# Altium PCB 1700-0002_InterfaceBoard_RevA.PcbDoc
Units mil, origin at the board's own origin, x right, y up, seen from the top; angles counter-clockwise.
Board outline 3850 x 4150 mil, 4 copper layers (Top, GND+Signal, PWR+Signal, Bottom), stack 69.687 mil thick; 247 components, 140 nets, 790 pads, 0 vias.
Unrouted connection lines stored in the file: 515.
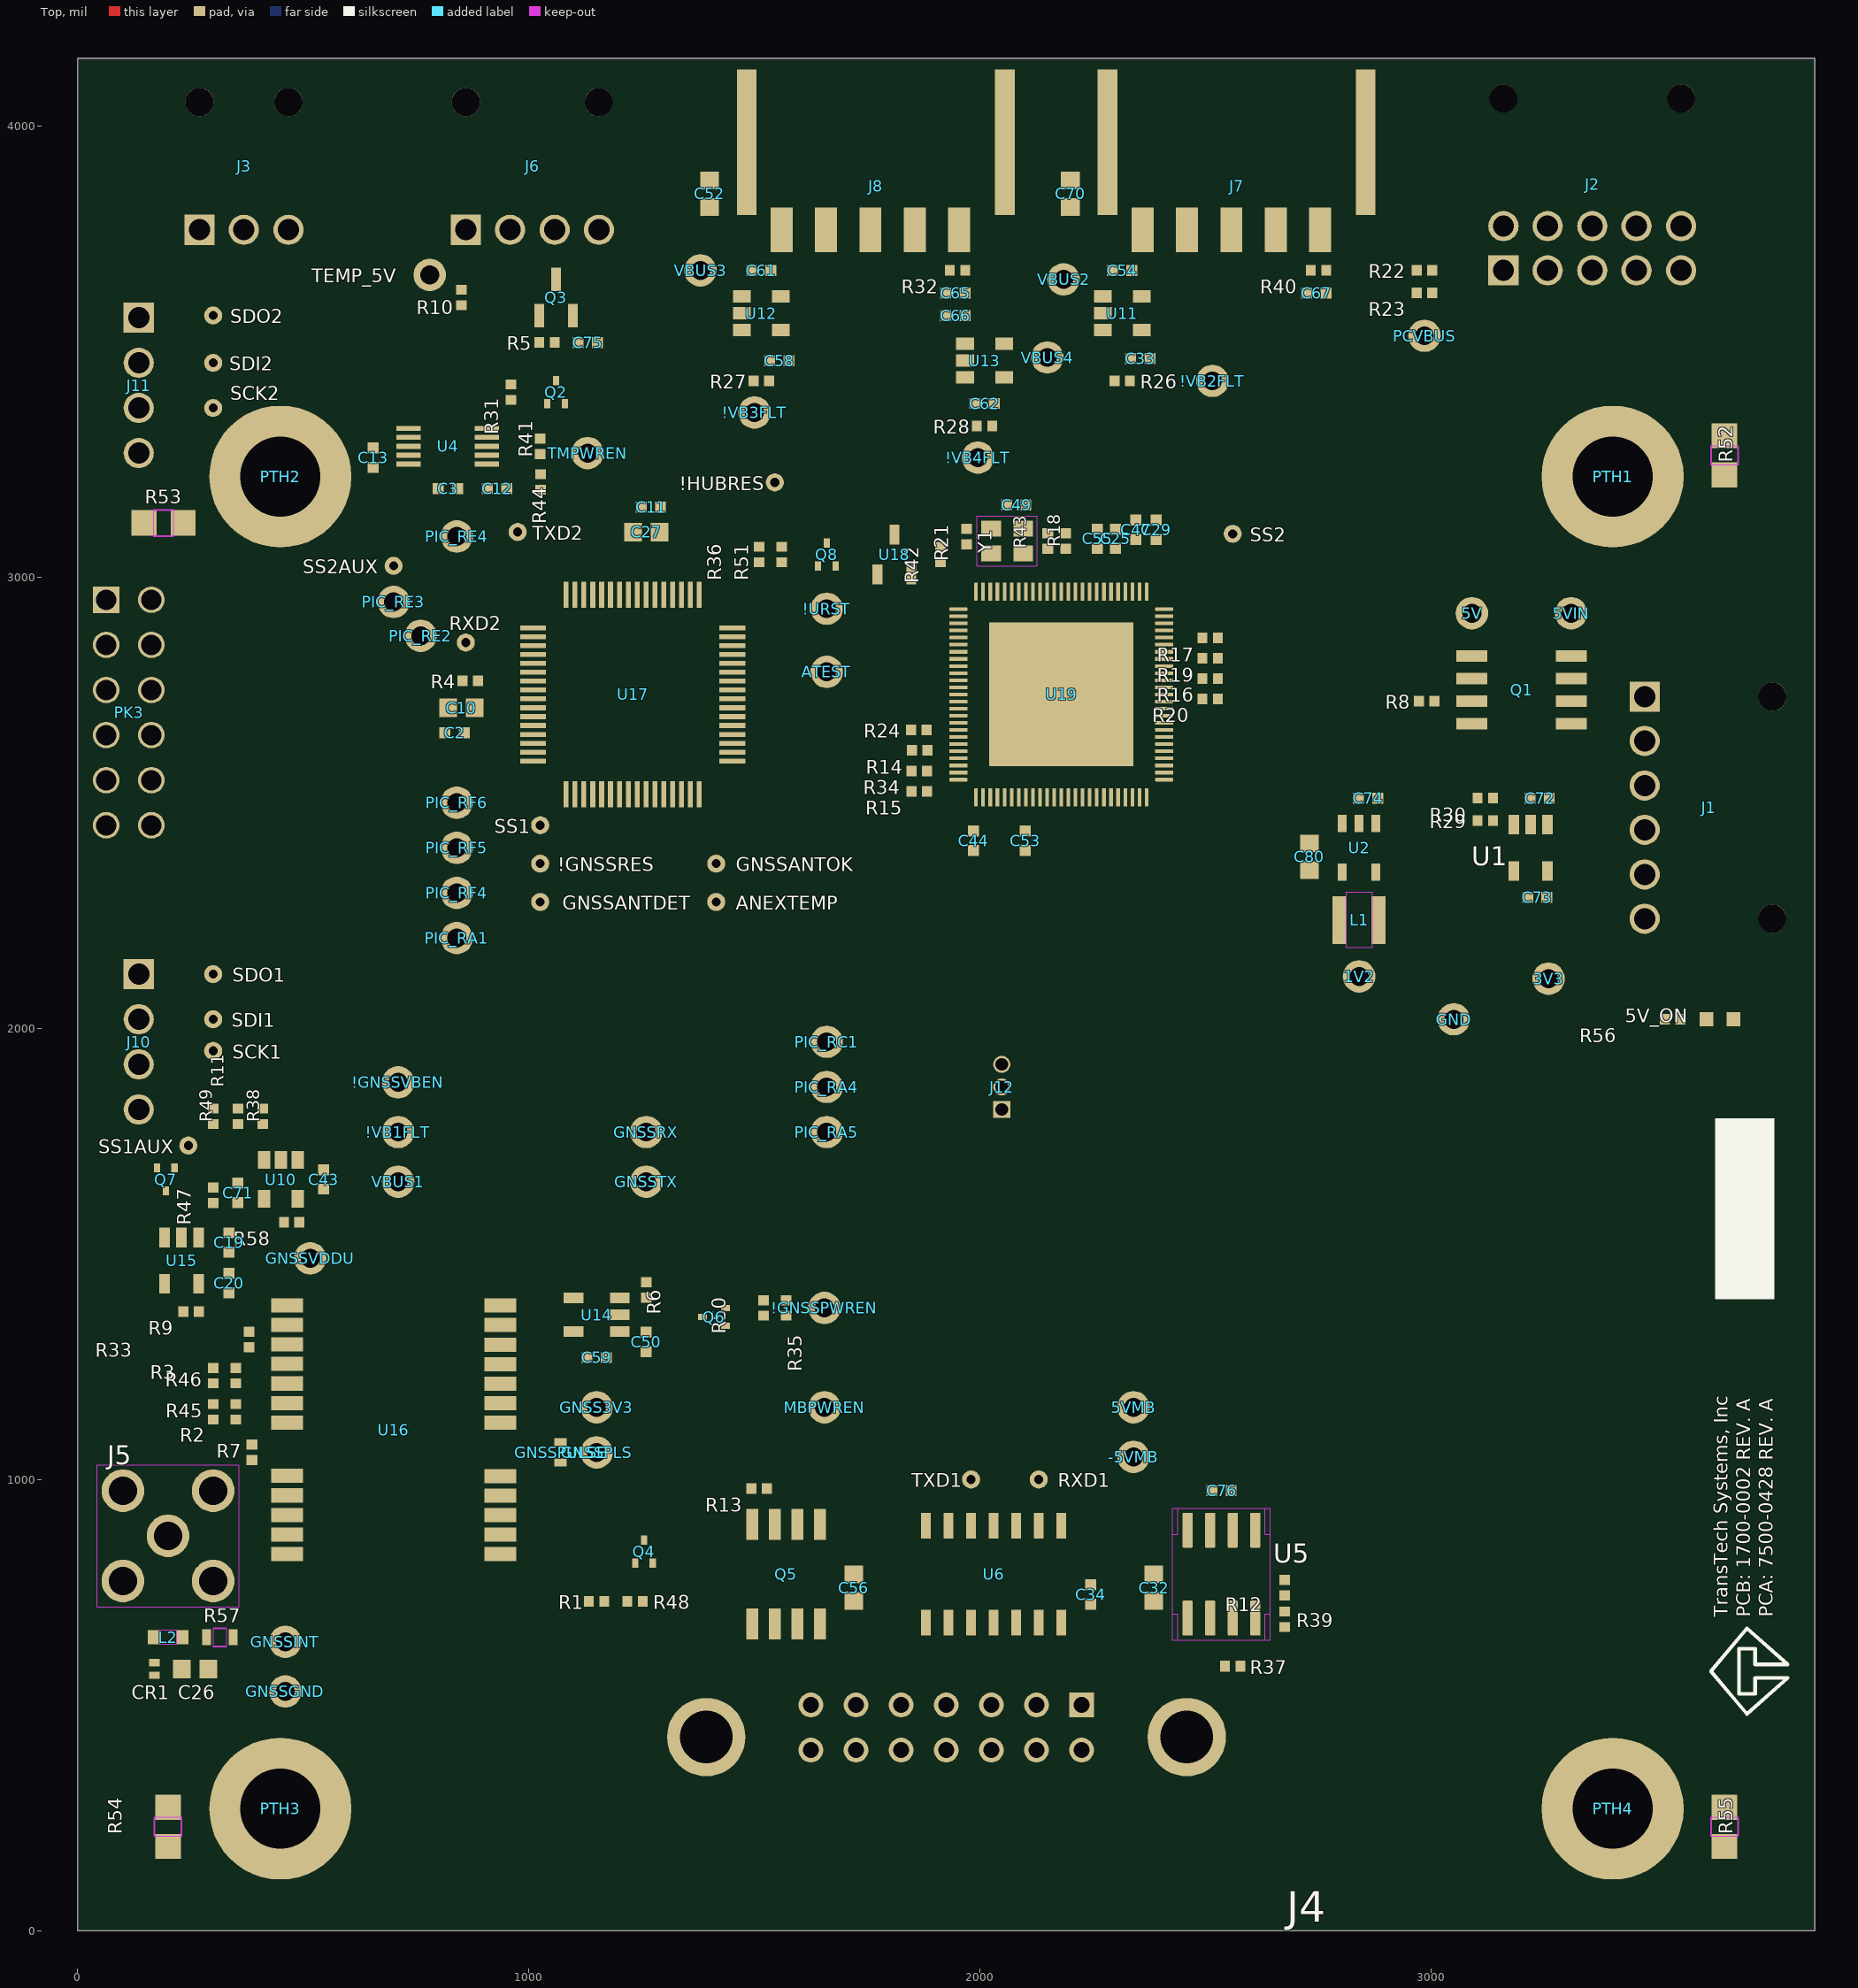
[diagram p0: Top view]
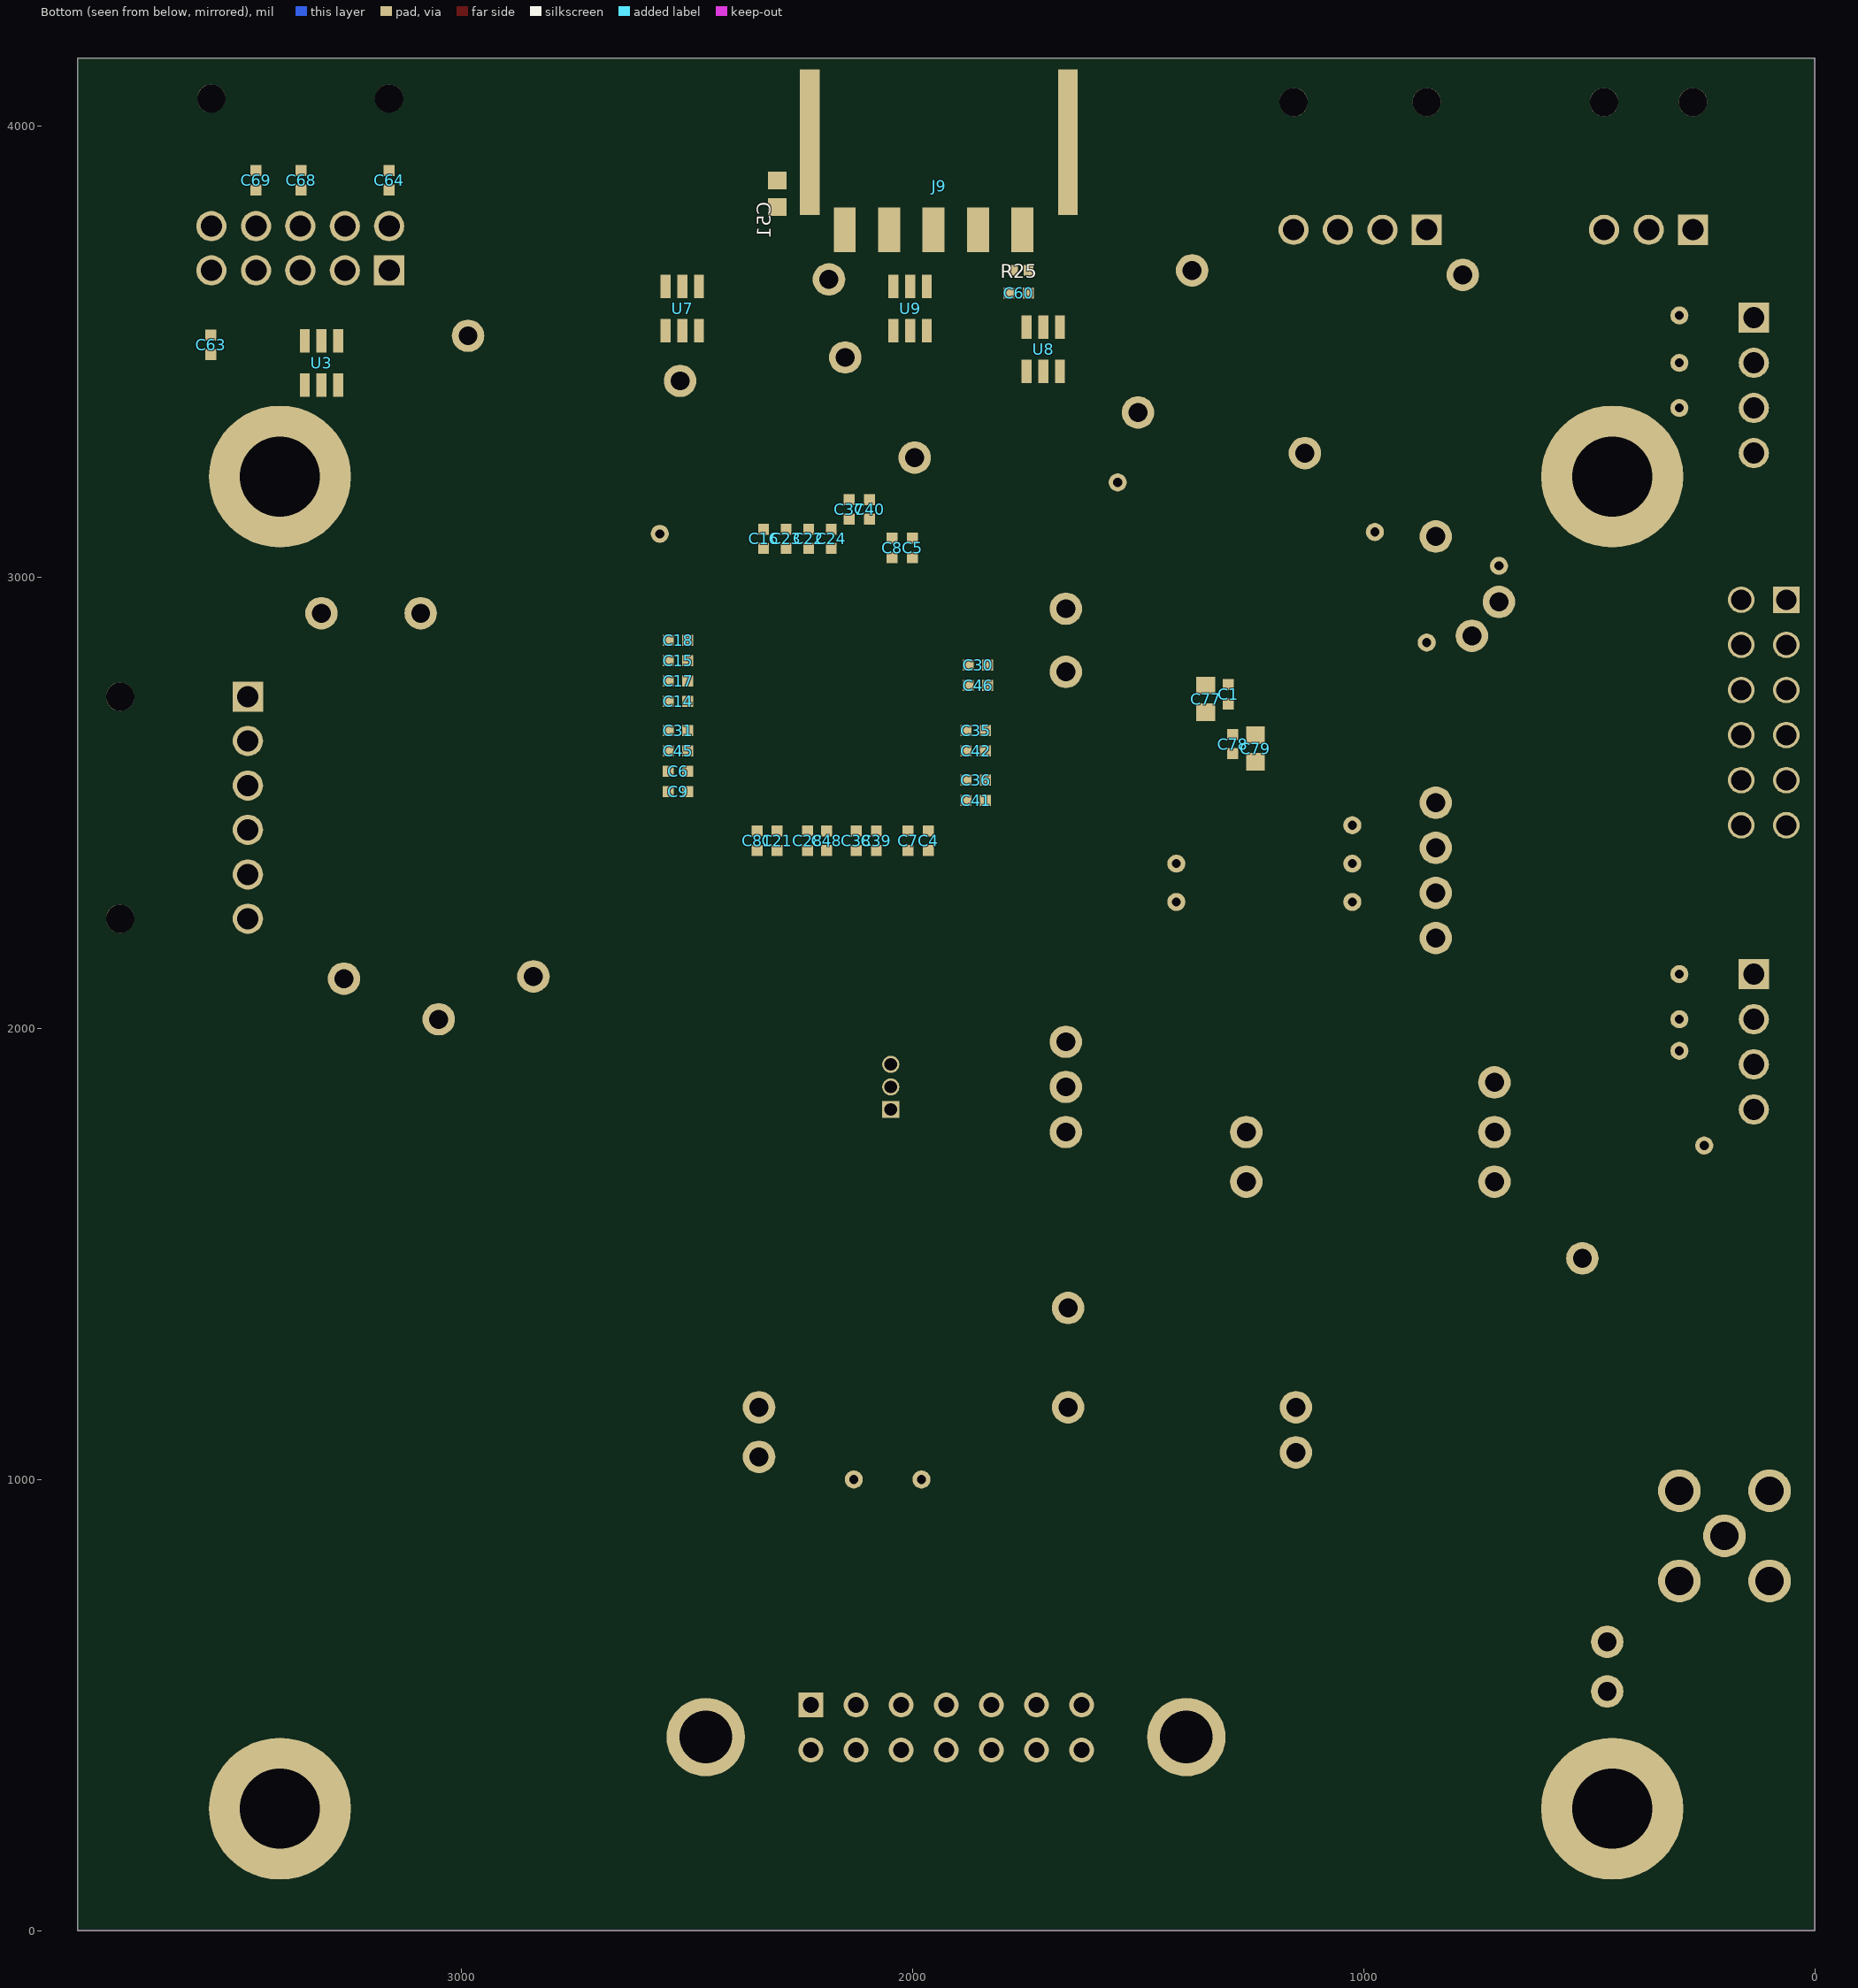
[diagram p1: Bottom view, seen from below]
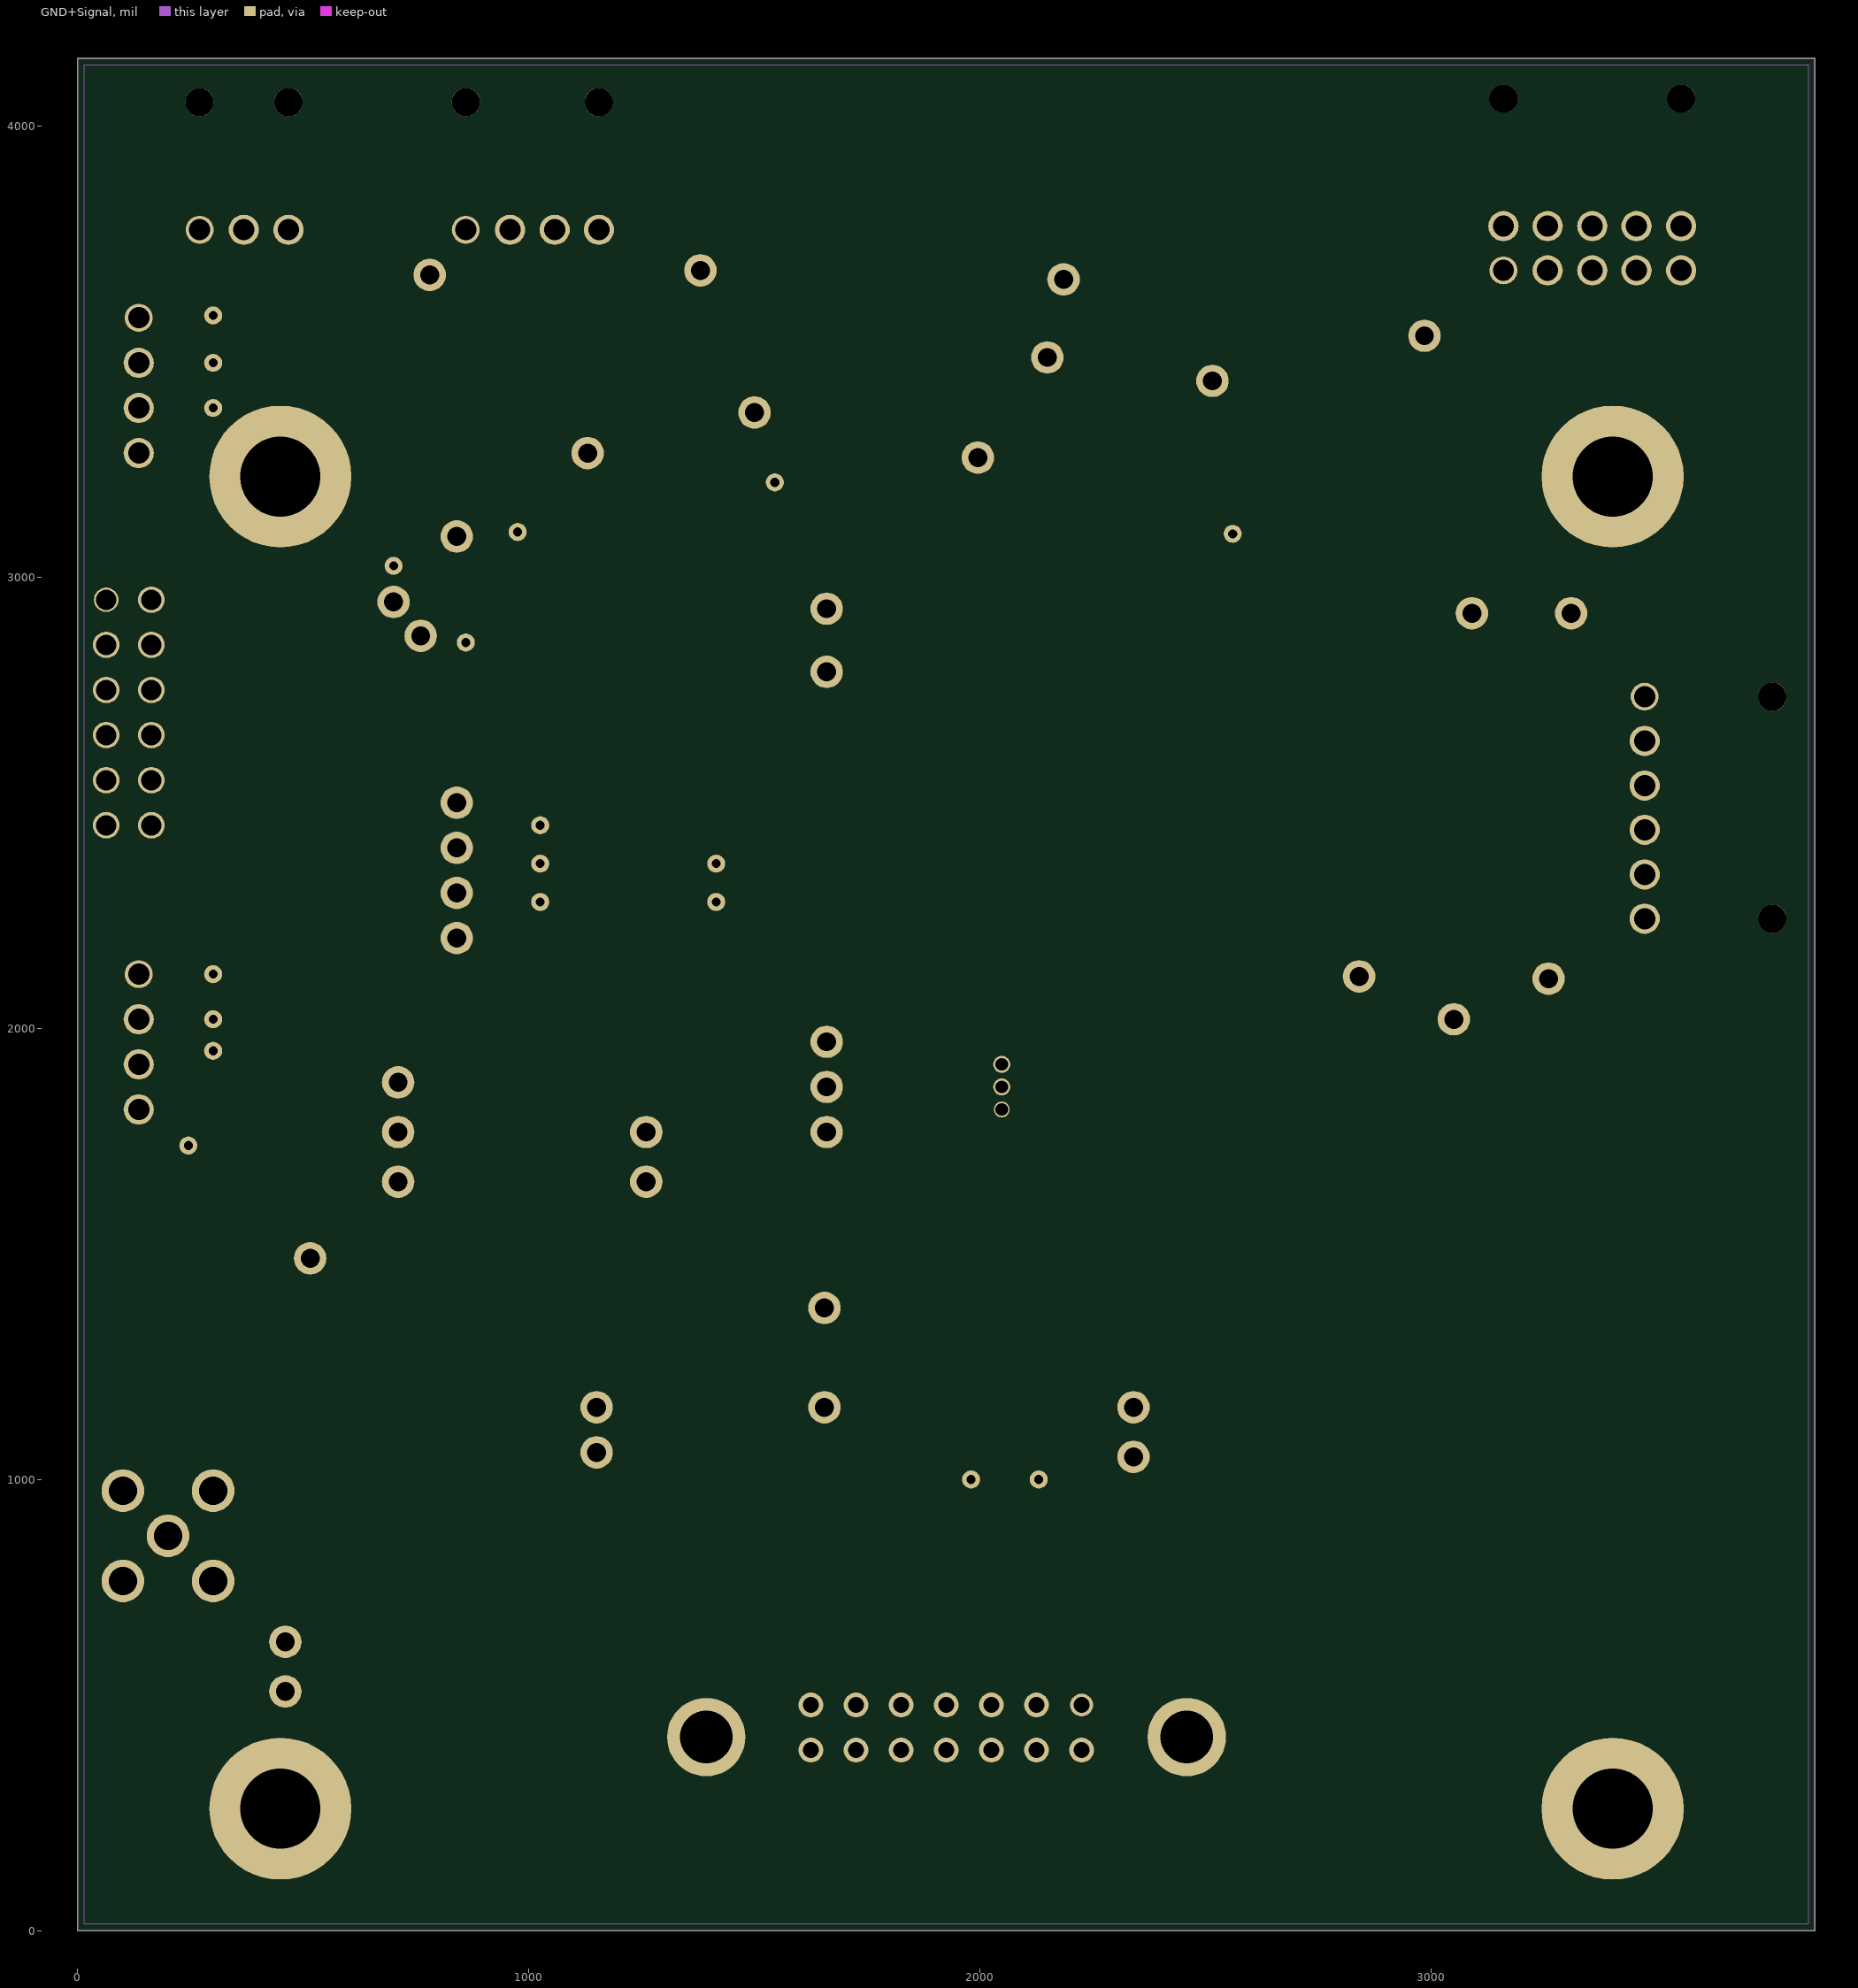
[diagram p2: GND+Signal]
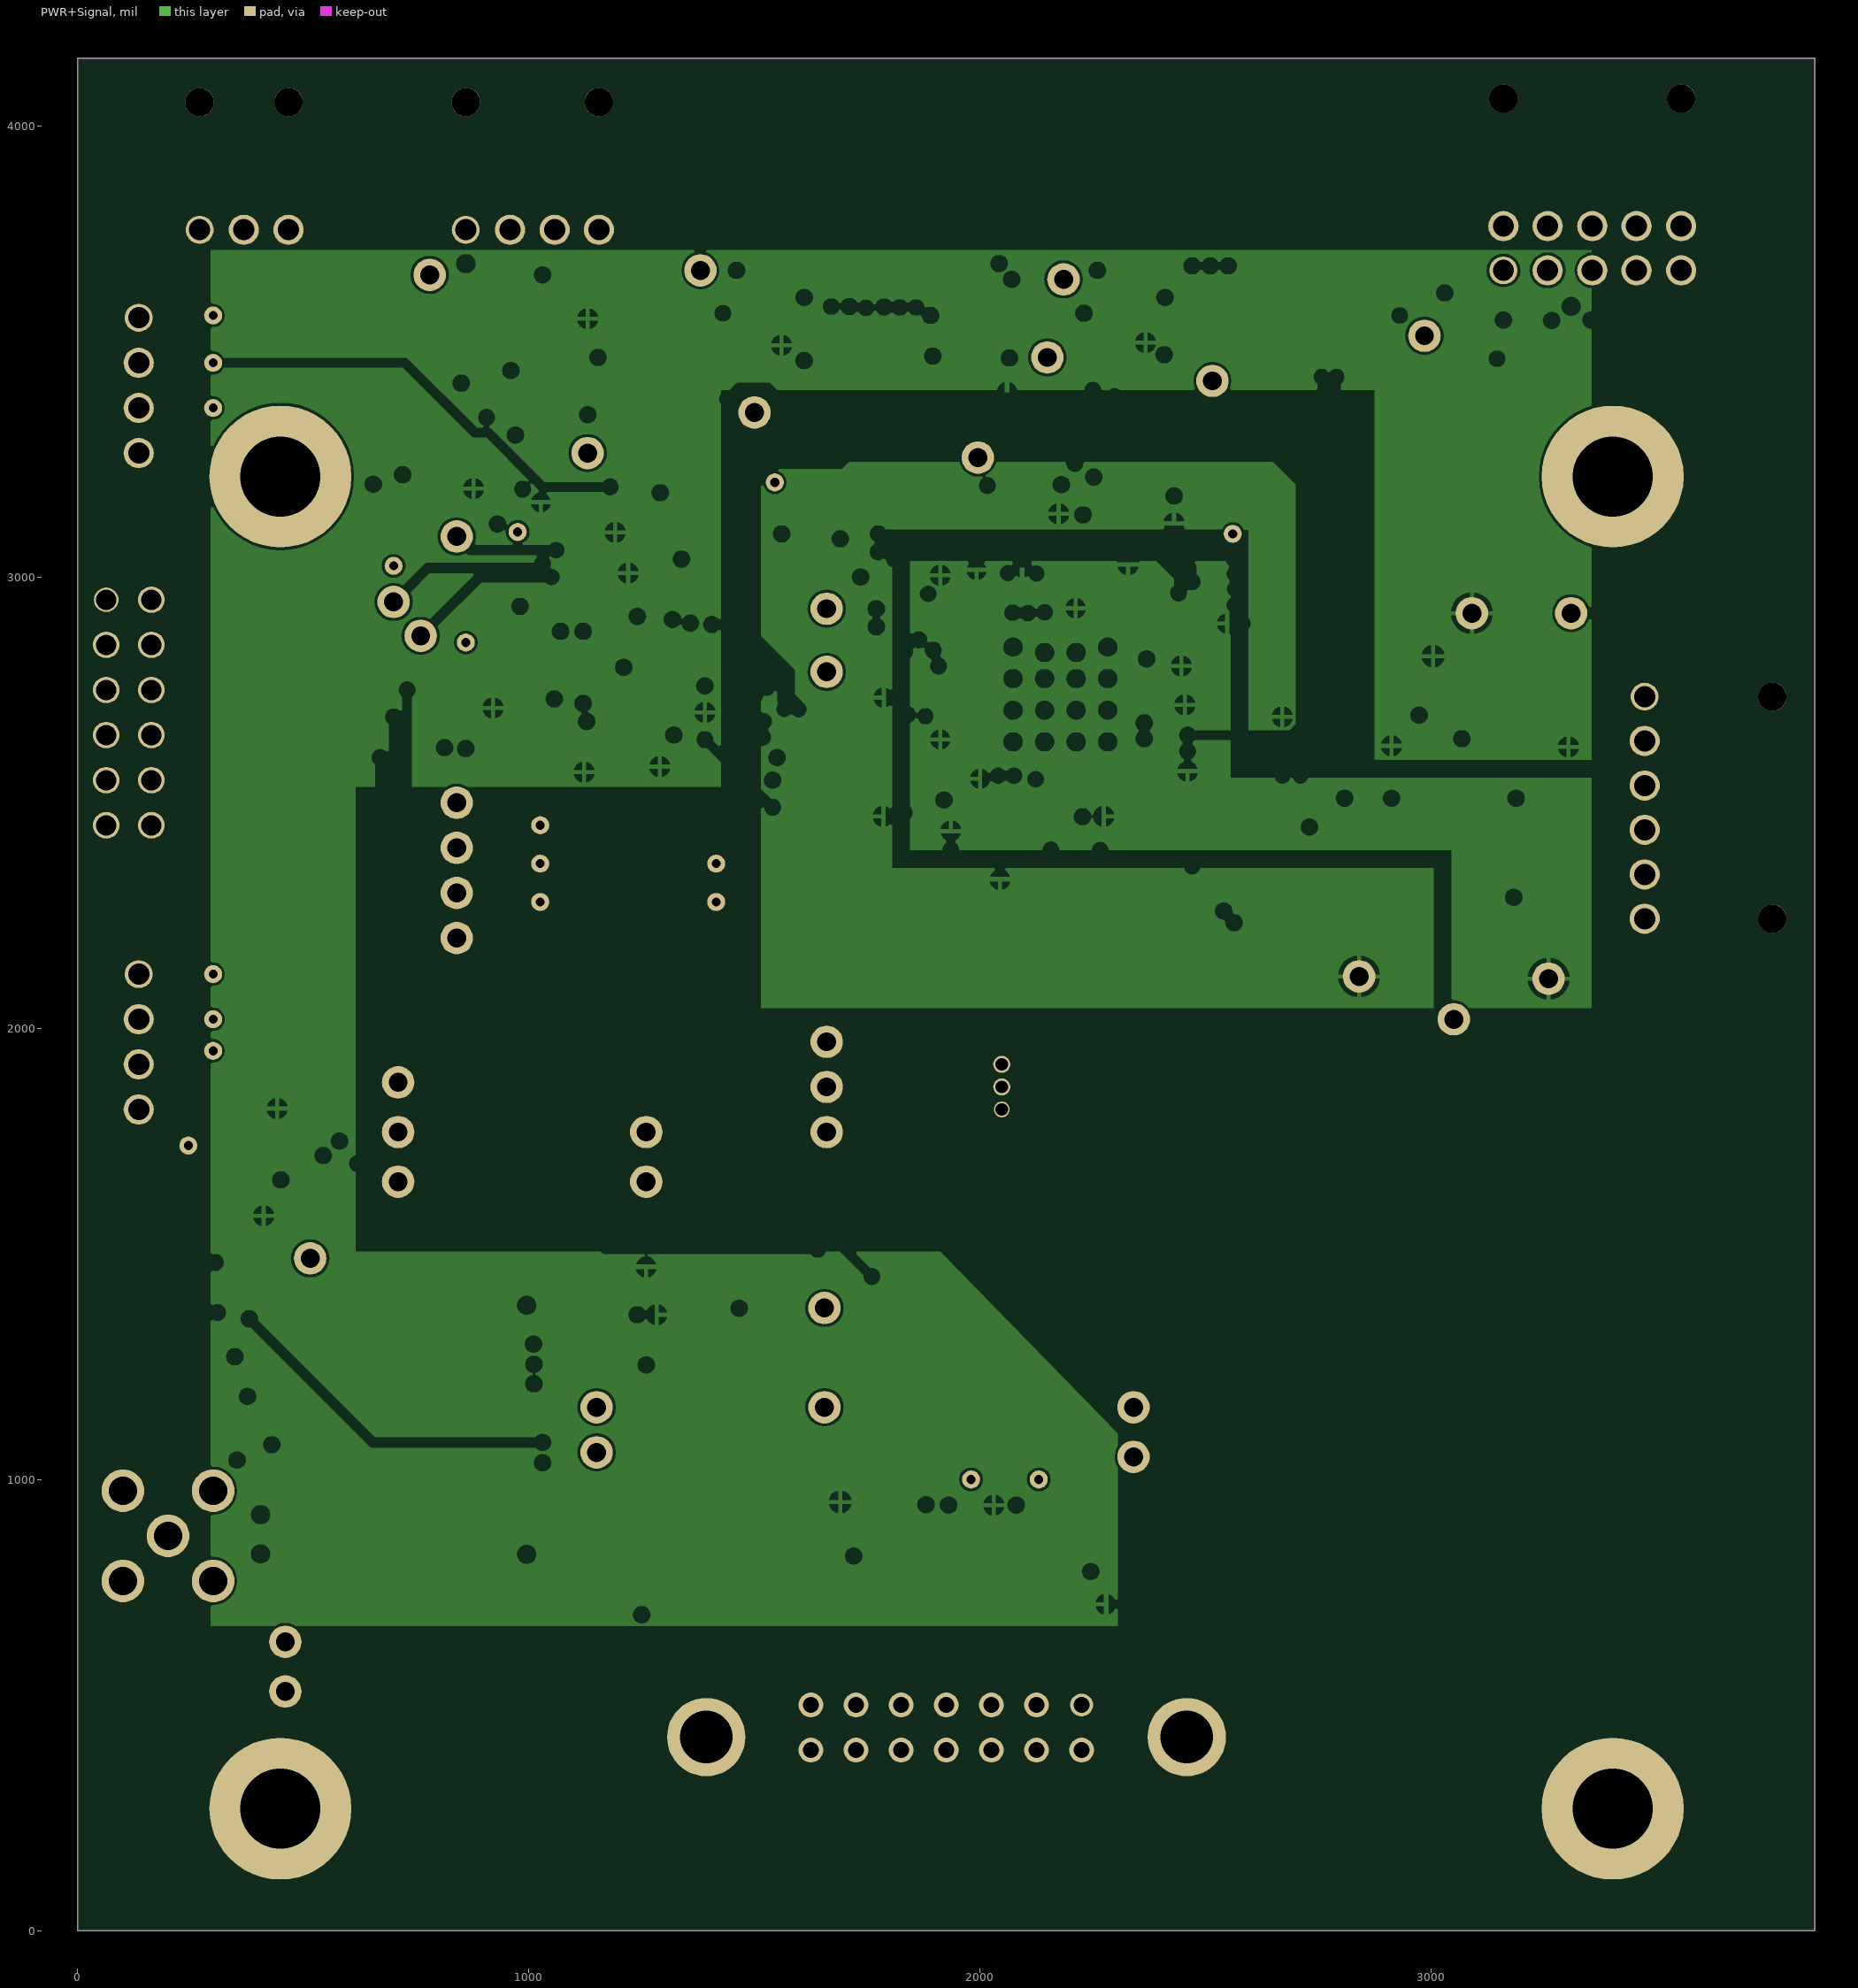
[diagram p3: PWR+Signal]

## Layer stack, top to bottom
Top Solder: solder mask 0.4, Solder Resist, Dk 3.5
Top: signal copper 1.378
Dielectric 1: core 4.3307, FR-4, Dk 4.8
GND+Signal: signal copper 1.378
Dielectric3: prepreg 47.2441, FR-4, Dk 4.8
PWR+Signal: signal copper 1.378
Dielectric2: dielectric 12.6, FR-4, Dk 4.8
Bottom: signal copper 1.378
Bottom Solder: solder mask 0.4, Solder Resist, Dk 3.5

## Board outline
0,4150 0,0 3850,0 3850,4150

## Design rules (kind name [scope] priority, off if disabled: settings)
BoardOutlineClearance mdCopperDimension [All] p1: gap=10 ignorepadtopadclearanceinfootprint=FALSE except(0: Arc-SplitContinuation Track-SplitContinuation SMDPad-SplitContinuation THPad-SplitContinuation Via-SplitContinuation Fill-SplitContinuation Poly-SplitContinuation Region-SplitContinuation Text-SplitContinuation; 20: Poly-OutlineEdge Poly-CavityEdge Poly-CutoutEdge Poly-SplitBarrior)
Clearance Clearance_for_PolygonClass_Isolate_2 [InPolygonClass('Isolate_2') vs IsArc Or IsTrack Or IsPad Or IsVia Or IsFill Or IsRegion Or IsText] p1: gap=2 ignorepadtopadclearanceinfootprint=FALSE
Clearance "Clearance (Same Net)" [All] p2: gap=6 ignorepadtopadclearanceinfootprint=FALSE
Clearance [All] p3: gap=6 ignorepadtopadclearanceinfootprint=FALSE
HoleSize [All] p1: absolutevalues=TRUE maxlimit=100000 minlimit=8 maxpercent=80.000 minpercent=20.000
HoleToHoleClearance mdDrill [All] p1: gap=10 allowstackedmicrovias=TRUE
MinimumSolderMaskSliver [All] p1 off: minsoldermaskwidth=10
PasteMaskExpansion Expansion_SMDPaste_OFF [InPadClass('SMDPaste_OFF')] p1: expansion=0
PasteMaskExpansion mlMinCreamFrame [All] p2: expansion=0
PolygonConnect PolygonConnect_For_PolygonThermal_ON_Width100000_Gap100000 [InPolygonClass('PolygonThermal_ON_Width100000_Gap100000')] p1: connectstyle=Relief reliefconductorwidth=10 reliefentries=4 polygonreliefangle="90 Angle" airgapwidth=10
PolygonConnect PolygonConnect_For_PolygonThermal_ON_Width120000_Gap100000 [InPolygonClass('PolygonThermal_ON_Width120000_Gap100000')] p2: connectstyle=Relief reliefconductorwidth=12 reliefentries=4 polygonreliefangle="90 Angle" airgapwidth=10
PolygonConnect ThermalVias [IsVia] p3: connectstyle=Relief reliefconductorwidth=10 reliefentries=4 polygonreliefangle="90 Angle" airgapwidth=10
PolygonConnect [All] p4: connectstyle=Relief reliefconductorwidth=10 reliefentries=4 polygonreliefangle="90 Angle" airgapwidth=10
RoutingVias [All] p1: holewidth=8 width=24 viastyle="Through Hole" minholewidth=8 minwidth=24 maxholewidth=100 maxwidth=100
SolderMaskExpansion mlMinStopFrame [All] p1: expansion=2 istentingtop=FALSE
Width [All] p1: maxlimit=10 minlimit=6 preferedwidth=6
26 further rules are at their usual default settings.

## Classes and differential pairs
polygon class PolygonThermal_ON_Width100000_Gap100000: Polygon_1_Net_1.2V Polygon_1_Net_3.3V Polygon_1_Net_5V
polygon class PolygonThermal_ON_Width120000_Gap100000: Polygon_1_Net_GND
polygon class Isolate_2: Polygon_1_Net_GND
pad class SMDPaste_OFF: U19-101

## Components (designator, comment, footprint, x,y, rotation, side; value= is the part's Value field where it differs from the comment)
1V2 "" TST_POINT_PTH_042-OCT 2840,2115 r0 top
3V3 "" TST_POINT_PTH_042-OCT 3260,2110 r0 top
5V "" TST_POINT_PTH_042-OCT 3090,2920 r0 top
5V_ON "" LED_0603_LITE-ON 3640,2020 r180 top
5VIN "" TST_POINT_PTH_042-OCT 3310,2920 r0 top
5VMB "" TST_POINT_PTH_042-OCT 2340,1160 r0 top
!GNSSPWREN "" TST_POINT_PTH_042-OCT 1655,1380 r0 top
!GNSSRES "" TST_POINT_PTH_20X40MIL_2PIN 1025,2365 r0 top
!GNSSVBEN "" TST_POINT_PTH_042-OCT 710,1880 r0 top
!HUBRES "" TST_POINT_PTH_20X40MIL_2PIN 1545,3210 r0 top
!URST "" TST_POINT_PTH_042-OCT 1660,2930 r0 top
!VB1FLT "" TST_POINT_PTH_042-OCT 710,1770 r0 top
!VB2FLT "" TST_POINT_PTH_042-OCT 2515,3435 r0 top
!VB3FLT "" TST_POINT_PTH_042-OCT 1500,3365 r0 top
!VB4FLT "" TST_POINT_PTH_042-OCT 1995,3265 r0 top
-5VMB "" TST_POINT_PTH_042-OCT 2340,1050 r0 top
ANEXTEMP "" TST_POINT_PTH_20X40MIL_2PIN 1415,2280 r0 top
ATEST "" TST_POINT_PTH_042-OCT 1660,2790 r0 top
C1 "" G-155_MUR 1300,2740 r90 bottom
C2 "" G-155_MUR 835,2655 r180 top
C3 "" G-155_MUR 820,3196 r0 top
C4 "" G-155_MUR 1965,2416 r270 bottom
C5 "" G-155_MUR 2000,3065 r90 bottom
C6 "" G-155_MUR 2520,2570 r0 bottom
C7 "" G-155_MUR 2010,2416 r270 bottom
C8 "" G-155_MUR 2045,3065 r90 bottom
C9 "" G-155_MUR 2520,2525 r0 bottom
C10 "" CAP_C1608_TDK 850,2710 r180 top
C11 "" G-155_MUR 1270,3155 r0 top
C12 "" G-155_MUR 929,3196 r0 top
C13 "" G-155_MUR 655,3265 r270 top
C14 "" G-155_MUR 2520,2725 r0 bottom
C15 "" G-155_MUR 2520,2815 r0 bottom
C16 "" G-155_MUR 2330,3085 r90 bottom
C17 "" G-155_MUR 2520,2770 r0 bottom
C18 "" G-155_MUR 2520,2860 r0 bottom
C19 "" G-155_MUR 335,1525 r270 top
C20 "" G-155_MUR 335,1435 r90 top
C21 "" G-155_MUR 2300,2416 r270 bottom
C22 "" G-155_MUR 2230,3085 r90 bottom
C23 "" G-155_MUR 2280,3085 r90 bottom
C24 "" G-155_MUR 2180,3085 r90 bottom
C25 "" G-155_MUR 2300,3085 r90 top
C26 "" CAP_C1608_TDK 260,580 r0 top
C27 "" CAP_C1608_TDK 1260,3100 r0 top
C28 "" G-155_MUR 2232,2416 r270 bottom
C29 "" G-155_MUR 2390,3105 r90 top
C30 "" G-155_MUR 1855,2805 r180 bottom
C31 "" G-155_MUR 2520,2660 r0 bottom
C32 "" CAP_C1608_TDK 2385,760 r90 top
C33 "" G-155_MUR 2355,3485 r0 top
C34 "" G-155_MUR 2245,745 r90 top
C35 "" G-155_MUR 1860,2660 r180 bottom
C36 "" G-155_MUR 1860,2550 r180 bottom
C37 "" G-155_MUR 2140,3150 r90 bottom
C38 "" G-155_MUR 2125,2416 r270 bottom
C39 "" G-155_MUR 2080,2416 r270 bottom
C40 "" G-155_MUR 2095,3150 r90 bottom
C41 "" G-155_MUR 1860,2505 r180 bottom
C42 "" G-155_MUR 1860,2615 r180 bottom
C43 "" G-155_MUR 545,1665 r90 top
C44 "" G-155_MUR 1985,2416 r270 top
C45 "" G-155_MUR 2520,2615 r0 bottom
C46 "" G-155_MUR 1855,2760 r180 bottom
C47 "" G-155_MUR 2345,3105 r90 top
C48 "" G-155_MUR 2190,2416 r270 bottom
C49 "" G-155_MUR 2080,3160 r180 top
C50 "" G-155_MUR 1260,1305 r270 top
C51 "" CAP_C1608_TDK 2300,3850 r90 bottom
C52 "" CAP_C1608_TDK 1400,3850 r90 top
C53 "" G-155_MUR 2100,2416 r270 top
C54 "" G-155_MUR 2315,3680 r180 top
C55 "" G-155_MUR 2260,3085 r90 top
C56 "" CAP_C1608_TDK 1720,760 r90 top
C58 "" G-155_MUR 1555,3480 r0 top
C59 "" G-155_MUR 1150,1270 r0 top
C60 "" G-155_MUR 1765,3630 r180 bottom
C61 "" G-155_MUR 1515,3680 r180 top
C62 "" G-155_MUR 2010,3385 r180 top
C63 "" G-155_MUR 3555,3515 r270 bottom
C64 "" G-155_MUR 3160,3880 r90 bottom
C65 "" G-155_MUR 1945,3630 r0 top
C66 "" G-155_MUR 1945,3580 r180 top
C67 "" G-155_MUR 2745,3630 r0 top
C68 "" G-155_MUR 3355,3880 r90 bottom
C69 "" G-155_MUR 3455,3880 r90 bottom
C70 "" CAP_C1608_TDK 2200,3850 r90 top
C71 "" G-155_MUR 355,1635 r90 top
C72 "" G-155_MUR 3240,2510 r180 top
C73 "" G-155_MUR 3235,2290 r180 top
C74 "" G-155_MUR 2860,2510 r180 top
C75 "" G-155_MUR 1130,3520 r0 top
C76 "" G-155_MUR 2535,975 r180 top
C77 "" CAP_C1608_TDK 1350,2730 r90 bottom
C78 "" G-155_MUR 1290,2630 r90 bottom
C79 "" CAP_C1608_TDK 1240,2620 r90 bottom
C80 "" CAP_C1608_TDK 2730,2380 r90 top
C81 "" G-155_MUR 2344,2416 r270 bottom
CR1 "" SOD-923F_COMCHIP 170,580 r270 top
GND "" TST_POINT_PTH_042-OCT 3050,2020 r0 top
GNSS3V3 "" TST_POINT_PTH_042-OCT 1150,1160 r0 top
GNSSANTDET "" TST_POINT_PTH_20X40MIL_2PIN 1025,2280 r0 top
GNSSANTOK "" TST_POINT_PTH_20X40MIL_2PIN 1415,2365 r0 top
GNSSGND "" TST_POINT_PTH_042-OCT 460,530 r0 top
GNSSINT "" TST_POINT_PTH_042-OCT 460,640 r0 top
GNSSPLS "" TST_POINT_PTH_042-OCT 1150,1060 r0 top
GNSSPULSE "" LED_DIALIGHT_598_DIA 1070,1060 r90 top
GNSSRX "" TST_POINT_PTH_042-OCT 1260,1770 r0 top
GNSSTX "" TST_POINT_PTH_042-OCT 1260,1660 r0 top
GNSSVDDU "" TST_POINT_PTH_042-OCT 515,1490 r0 top
J1 "" CON_1053131306 3473,2735 r90 top
J2 "" CON_1053141310 3160,3680 r180 top
J3 "" CON_1053131303 270,3770 r180 top
J4 "" 3M_N3314-5302RB_RA 1925,450 r180 top
J5 "" SAMTEC_SMA-J-P-X-ST-TH1 200,875 r0 top
J6 "" CON_1053131304 860,3770 r180 top
J7 "" CON_1054301305_MOL 2360,3770 r180 top
J8 "" CON_1054301305_MOL 1560,3770 r180 top
J9 "" CON_1054301305_MOL 2150,3770 r0 bottom
J10 "" MOLEX_VERT-HDR_171861004 135,1970 r270 top
J11 "" MOLEX_VERT-HDR_171861004 135,3425 r270 top
J12 "" CONN_GRPB031VWVN-RC_SUL 2048,1820 r90 top
L1 "" IND_TAIYO_NR3012_TAY 2840,2240 r0 top
L2 "" INDUCTOR_0603_TDK 200,650 r0 top
MBPWREN "" TST_POINT_PTH_042-OCT 1655,1160 r0 top
PCVBUS "" TST_POINT_PTH_042-OCT 2985,3535 r0 top
PIC_RA1 "" TST_POINT_PTH_042-OCT 840,2200 r0 top
PIC_RA4 "" TST_POINT_PTH_042-OCT 1660,1870 r0 top
PIC_RA5 "" TST_POINT_PTH_042-OCT 1660,1770 r0 top
PIC_RC1 "" TST_POINT_PTH_042-OCT 1660,1970 r0 top
PIC_RE2 "" TST_POINT_PTH_042-OCT 760,2870 r0 top
PIC_RE3 "" TST_POINT_PTH_042-OCT 700,2945 r0 top
PIC_RE4 "" TST_POINT_PTH_042-OCT 840,3090 r0 top
PIC_RF4 "" TST_POINT_PTH_042-OCT 840,2300 r0 top
PIC_RF5 "" TST_POINT_PTH_042-OCT 840,2400 r0 top
PIC_RF6 "" TST_POINT_PTH_042-OCT 840,2500 r0 top
PK3 "" CON_901311086_MOL 63,2950 r270 top
PTH1 "" PTH_M4_4.5MM-ID 3402,3223 r0 top
PTH2 "" PTH_M4_4.5MM-ID 449,3223 r0 top
PTH3 "" PTH_M4_4.5MM-ID 449,270 r0 top
PTH4 "" PTH_M4_4.5MM-ID 3402,270 r0 top
Q1 "" SO-8L-NB_FAS 3200,2750 r0 top
Q2 "" SC-75(SOT-416)_ONSEMI 1060,3410 r0 top
Q3 "" SOT_1CDS-T1-BE3_VIS 1060,3620 r0 top
Q4 "" SC-75(SOT-416)_ONSEMI 1255,840 r0 top
Q5 "" SO-8L-NB_FAS 1570,790 r270 top
Q6 "" SC-75(SOT-416)_ONSEMI 1410,1360 r90 top
Q7 "" SC-75(SOT-416)_ONSEMI 195,1665 r180 top
Q8 "" SC-75(SOT-416)_ONSEMI 1660,3050 r0 top
R1 "" RESC1005X35N 1150,730 r0 top
R2 "" RESC1005X35N 350,1150 r90 top
R3 "" RESC1005X35N 350,1230 r90 top
R4 "" RESC1005X35N 870,2770 r0 top
R5 "" RESC1005X35N 1040,3520 r0 top
R6 "" RESC1005X35N 1260,1420 r90 top
R7 "" RESC1005X35N 386,1060 r90 top
R8 "" RESC1005X35N 2990,2725 r0 top
R9 "" RESC1005X35N 251,1372 r180 top
R10 "" RESC1005X35N 850,3620 r90 top
R11 "" RESC1005X35N 355,1805 r270 top
R12 "" RESC1005X35N 2675,760 r90 top
R13 "" RESC1005X35N 1510,980 r180 top
R14 "" RESC1005X35N 1866,2616 r180 top
R15 "" RESC1005X35N 1865,2525 r180 top
R16 "" RESC1005X35N 2510,2775 r180 top
R17 "" RESC1005X35N 2510,2865 r180 top
R18 "" RESC1005X35N 2190,3080 r90 top
R19 "" RESC1005X35N 2510,2820 r180 top
R20 "" RESC1005X35N 2510,2730 r180 top
R21 "" RESC1005X35N 1970,3090 r270 top
R22 "" RESC1005X35N 2985,3680 r0 top
R23 "" RESC1005X35N 2985,3630 r180 top
R24 "" RESC1005X35N 1864,2661 r180 top
R25 "" RESC1005X35N 1760,3680 r0 bottom
R26 "" RESC1005X35N 2315,3435 r0 top
R27 "" RESC1005X35N 1515,3435 r0 top
R28 "" RESC1005X35N 2010,3335 r0 top
R29 "" RESC1005X35N 3120,2460 r0 top
R30 "" RESC1005X35N 3120,2510 r180 top
R31 "" RESC1005X35N 960,3410 r90 top
R32 "" RESC1005X35N 1950,3680 r180 top
R33 "" RESC1005X35N 380,1310 r90 top
R34 "" RESC1005X35N 1865,2570 r180 top
R35 "" RESC1005X35N 1570,1380 r270 top
R36 "" RESC1005X35N 1510,3050 r270 top
R37 "" RESC1005X35N 2560,586 r180 top
R38 "" RESC1005X35N 410,1805 r90 top
R39 "" RESC1005X35N 2675,690 r270 top
R40 "" RESC1005X35N 2750,3680 r180 top
R41 "" RESC1005X35N 1025,3290 r270 top
R42 "" RESC1005X35N 1912,3050 r90 top
R43 "" RESC1005X35N 2150,3080 r90 top
R44 "" RESC1005X35N 1026,3211 r270 top
R45 "" RESC1005X35N 300,1150 r90 top
R46 "" RESC1005X35N 300,1230 r90 top
R47 "" RESC1005X35N 300,1630 r90 top
R48 "" RESC1005X35N 1235,730 r0 top
R49 "" RESC1005X35N 300,1805 r90 top
R50 "" RESC1005X35N 1520,1380 r90 top
R51 "" RESC1005X35N 1560,3050 r90 top
R52 "" STA_HCJ0805_STP 3650,3270 r270 top
R53 "" STA_HCJ0805_STP 190,3120 r0 top
R54 "" STA_HCJ0805_STP 200,230 r90 top
R55 "" STA_HCJ0805_STP 3650,230 r90 top
R56 "" RESC1005X35N 3535,2020 r180 top
R57 "" STA_RMCF0603_STP 315,650 r0 top
R58 "" RESC1005X35N 474,1570 r0 top
RXD1 "" TST_POINT_PTH_20X40MIL_2PIN 2130,1000 r0 top
RXD2 "" TST_POINT_PTH_20X40MIL_2PIN 860,2855 r0 top
SCK1 "" TST_POINT_PTH_20X40MIL_2PIN 300,1950 r0 top
SCK2 "" TST_POINT_PTH_20X40MIL_2PIN 300,3375 r0 top
SDI1 "" TST_POINT_PTH_20X40MIL_2PIN 300,2020 r0 top
SDI2 "" TST_POINT_PTH_20X40MIL_2PIN 300,3475 r0 top
SDO1 "" TST_POINT_PTH_20X40MIL_2PIN 300,2120 r0 top
SDO2 "" TST_POINT_PTH_20X40MIL_2PIN 300,3580 r0 top
SS1 "" TST_POINT_PTH_20X40MIL_2PIN 1025,2450 r0 top
SS1AUX "" TST_POINT_PTH_20X40MIL_2PIN 245,1740 r0 top
SS2 "" TST_POINT_PTH_20X40MIL_2PIN 2560,3096 r0 top
SS2AUX "" TST_POINT_PTH_20X40MIL_2PIN 700,3025 r0 top
TEMP_5V "" TST_POINT_PTH_042-OCT 780,3670 r0 top
TMPWREN "" TST_POINT_PTH_042-OCT 1130,3275 r0 top
TXD1 "" TST_POINT_PTH_20X40MIL_2PIN 1980,1000 r0 top
TXD2 "" TST_POINT_PTH_20X40MIL_2PIN 975,3100 r0 top
U1 "" DBV0005A_L 3220,2400 r270 top
U2 "" DBV5_TEX 2840,2400 r270 top
U3 "" SOT-23-6_AOS 3310,3475 r270 bottom
U4 "" 21-0061L_MXM 820,3290 r180 top
U5 "" SOIC127P600X175-8N 2535,790 r270 top
U6 "" 21-0041B_14_MXM 2030,790 r270 top
U7 "" SOT-23-6_AOS 2510,3595 r270 bottom
U8 "" SOT-23-6_AOS 1710,3505 r270 bottom
U9 "" SOT-23-6_AOS 2005,3595 r270 bottom
U10 "" TSOT-25_DIODES-INC 450,1665 r270 top
U11 "" TSOT-25_DIODES-INC 2315,3585 r0 top
U12 "" TSOT-25_DIODES-INC 1515,3585 r0 top
U13 "" TSOT-25_DIODES-INC 2010,3480 r0 top
U14 "" DBV0005A_L 1150,1365 r180 top
U15 "" DBV0005A_L 230,1485 r270 top
U16 "" UBLOX_24LCC 700,1110 r180 top
U17 "" TQFP64_10X10MC_MCH 1230,2740 r0 top
U18 "" SOT-23_M3_MCH 1810,3050 r0 top
U19 "" VQFN100_KDX_MCH 2180,2740 r0 top
VBUS1 "" TST_POINT_PTH_042-OCT 710,1660 r0 top
VBUS2 "" TST_POINT_PTH_042-OCT 2185,3660 r0 top
VBUS3 "" TST_POINT_PTH_042-OCT 1380,3680 r0 top
VBUS4 "" TST_POINT_PTH_042-OCT 2149,3487 r0 top
Y1 "" OSC_ECS-2033-250-BN 2060,3080 r180 top

## Footprints (in the part's own frame and the unit in brackets; to place one, negate y for a bottom-side part, rotate by r counter-clockwise, add the part's x,y. Pads: shape width x height; smd on the part's side, far side on the other; paste and mask are expansions set on the pad)
3M_N3314-5302RB_RA [mil] "3M_N3314-5302RB_RA"
  rect 55x55 / inner round 50.81 / far side rect 55x55 hole 35: 1(-300,-50)
  round 55 hole 35: 2(-300,50) 3(-200,-50) 4(-200,50) 5(-100,-50) 6(-100,50) 7(0,-50) 8(0,50) 9(100,-50) 10(100,50) 11(200,-50) 12(200,50) 13(300,-50) 14(300,50)
  round 174 hole 116: 15(-533,21) 16(532,21)
21-0041B_14_MXM [mil] "21-0041B_14_MXM"
  rect 57.5x21 smd: 1(-107.25,150) 2(-107.25,100) 3(-107.25,50) 4(-107.25,0) 5(-107.25,-50) 6(-107.25,-100) 7(-107.25,-150) 8(107.25,-150) 9(107.25,-100) 10(107.25,-50) 11(107.25,0) 12(107.25,50) 13(107.25,100) 14(107.25,150)
21-0061L_MXM [mil] "21-0061L_MXM"
  rect 53.5x11 smd: 1(-86.75,39.37) 2(-86.75,19.69) 3(-86.75,0) 4(-86.75,-19.69) 5(-86.75,-39.37) 6(86.75,-39.37) 7(86.75,-19.69) 8(86.75,0) 9(86.75,19.69) 10(86.75,39.37)
CAP_C1608_TDK [mm] "CAP_C1608_TDK"
  rect 1x1.05 smd: 1(-0.75,0) 2(0.75,0)
CON_901311086_MOL [mil] "CON_901311086_MOL"
  rect 59x59 / inner round 54.51 / far side rect 59x59 hole 45: 1(0,0)
  round 59 hole 45: 2(0,100) 3(100,0) 4(100,100) 5(200,0) 6(200,100) 7(300,0) 8(300,100) 9(400,0) 10(400,100) 11(500,0) 12(500,100)
CON_1053131303 [mil] "CON_1053131303"
  rect 67x67 / inner round 61.9 / far side rect 67x67 hole 47: 1(0,0)
  round 67 hole 47: 2(-98,0) 3(-197,0)
  round 63 hole 63: 4(0,-283) 5(-197,-283)
CON_1053131304 [mil] "CON_1053131304"
  rect 67x67 / inner round 61.9 / far side rect 67x67 hole 47: 1(0,0)
  round 67 hole 47: 2(-98,0) 3(-197,0) 4(-295,0)
  round 63 hole 63: 5(0,-283) 6(-295,-283)
CON_1053131306 [mil] "CON_1053131306"
  rect 67x67 / inner round 61.9 / far side rect 67x67 hole 47: 1(0,0)
  round 67 hole 47: 2(-98,0) 3(-197,0) 4(-295,0) 5(-394,0) 6(-492,0)
  round 63 hole 63: 7(0,-283) 8(-492,-283)
CON_1053141310 [mil] "CON_1053141310"
  rect 67x67 / inner round 61.9 / far side rect 67x67 hole 47: 1(0,0)
  round 67 hole 47: 2(-98,0) 3(-197,0) 4(-295,0) 5(-394,0) 6(0,-98) 7(-98,-98) 8(-197,-98) 9(-295,-98) 10(-394,-98)
  round 63 hole 63: 11(0,-381) 12(-394,-381)
CON_1054301305_MOL [mm] "CON_1054301305_MOL"
  rect 1.24x2.5 smd: 1(0,0) 2(-2.5,0) 3(-5,0) 4(-7.5,0) 5(-10,0)
  rect 1.1x8.2 smd: 6(1.97,-4.93) 7(-12.57,-4.93)
CONN_GRPB031VWVN-RC_SUL [mil] "CONN_GRPB031VWVN-RC_SUL"
  rect 38x38 / inner round 35.11 / far side rect 38x38 hole 28: 1(0,0)
  round 38 hole 28: 2(50,0) 3(100,0)
DBV5_TEX [mil] "DBV5_TEX"
  rect 38.5x20 smd: 1(-53.75,37.4) 2(-53.75,0) 3(-53.75,-37.4) 4(53.75,-37.4) 5(53.75,37.4)
DBV0005A_L [mil] "DBV0005A_L"
  rect 43.31x23.62 smd: 1(-51.18,37.4) 2(-51.18,0) 3(-51.18,-37.4) 4(51.18,-37.4) 5(51.18,37.4)
G-155_MUR [mm] "G-155_MUR"
  rect 0.62x0.62 smd: 1(-0.546,0) 2(0.546,0)
IND_TAIYO_NR3012_TAY [mil] "IND_TAIYO_NR3012_TAY"
  rect 31.5x106 smd: 1(-43.25,0) 2(43.25,0)
  Top keep-out region: -28.5,62 28.5,62 28.5,-62 -28.5,-62
INDUCTOR_0603_TDK [mil] "INDUCTOR_0603_TDK"
  rect 27.56x31.5 smd: 1(-31.5,0) 2(31.5,0)
  Top keep-out region: -18,16 18,16 18,-16 -18,-16
LED_0603_LITE-ON [mil] "LED_0603_LITE-ON"
  rect 31x31 smd: 1(-30,0) 2(30,0)
LED_DIALIGHT_598_DIA [mil] "LED_DIALIGHT_598_DIA"
  rect 17.5x28 smd: 1(-22.75,0) 2(22.75,0)
MOLEX_VERT-HDR_171861004 [mil] "MOLEX_VERT-HDR_171861004"
  rect 67x67 / inner round 61.9 / far side rect 67x67 hole 47: 1(-150,0)
  round 67 hole 47: 2(-50,0) 3(50,0) 4(150,0)
OSC_ECS-2033-250-BN [mil] "OSC_ECS-2033-250-BN"
  rect 43.31x35.43 smd: 1(-35.43,-27.56) 2(35.43,-27.56) 3(35.43,27.56) 4(-35.43,27.56)
  Top keep-out lines w1.97: 66.93,55.12 -66.93,55.12 -66.93,-55.12 66.93,-55.12 66.93,55.12
PTH_M4_4.5MM-ID [mm] "PTH_M4_4.5MM-ID"
  round 8 hole 4.5: P$1(0,0)
RESC1005X35N [mil] "RESC1005X35N"
  rect 22.05x23.62 smd: 1(-17.13,0) 2(17.13,0)
SAMTEC_SMA-J-P-X-ST-TH1 [mil] "SAMTEC_SMA-J-P-X-ST-TH1"
  round 94.48 hole 62.99: 1(0,0) 2(100,-100) 3(100,100) 4(-100,100) 5(-100,-100)
  Top keep-out lines w1.97: -157.48,-157.48 157.48,-157.48 157.48,157.48 -157.48,157.48 -157.48,-157.48
SC-75(SOT-416)_ONSEMI [mil] "SC-75(SOT-416)_ONSEMI"
  rect 14x20 smd: 1(-19.5,-25.5) 2(19.5,-25.5) 3(0,25.5)
SO-8L-NB_FAS [mil] "SO-8L-NB_FAS"
  rect 69x26 smd: 1(-110.24,75) 2(-110.24,25) 3(-110.24,-25) 4(-110.24,-75) 5(110.24,-75) 6(110.24,-25) 7(110.24,25) 8(110.24,75)
SOD-923F_COMCHIP [mil] "SOD-923F_COMCHIP"
  rect 16x24 smd: 1(-14,0) 2(14,0)
SOIC127P600X175-8N [mil] "SOIC127P600X175-8N"
  rrect25% 77.56x23.23 smd: 1(-97.44,75) 2(-97.44,25) 3(-97.44,-25) 4(-97.44,-75) 5(97.44,-75) 6(97.44,-25) 7(97.44,25) 8(97.44,75)
  Top keep-out lines w1.97: 88.58,-108.27 146.06,-108.27 146.06,-96.85 ; 88.58,-108.27 88.58,-96.85 146.06,-96.85 ; 88.58,-108.27 -88.58,-108.27 ; -88.58,-108.27 -146.06,-108.27 -146.06,-96.85 ; -88.58,-108.27 -88.58,-96.85 -146.06,-96.85 ; 146.06,-96.85 146.06,96.85 ; -146.06,-96.85 -146.06,96.85 ; 146.06,96.85 146.06,108.27 88.58,108.27 ; 146.06,96.85 88.58,96.85 88.58,108.27 ; -146.06,96.85 -146.06,108.27 -88.58,108.27 ; -146.06,96.85 -88.58,96.85 -88.58,108.27 ; 88.58,108.27 -88.58,108.27
SOT-23-6_AOS [mil] "SOT-23-6_AOS"
  rect 52x22 smd: 1(-49,37) 2(-49,0) 3(-49,-37) 4(49,-37) 5(49,0) 6(49,37)
SOT-23_M3_MCH [mil] "SOT-23_M3_MCH"
  rect 22x44 smd: 1(-37.4,-44) 2(37.4,-44) 3(0,44)
SOT_1CDS-T1-BE3_VIS [mil] "SOT_1CDS-T1-BE3_VIS"
  rect 22x52 smd: 1(-37.4,-40) 2(37.4,-40) 3(0,40)
STA_HCJ0805_STP [mil] "STA_HCJ0805_STP"
  rect 55.12x56.69 smd: 1(-43.31,0) 2(43.31,0)
  Top keep-out region: -21.5,30.5 21.5,30.5 21.5,-30.5 -21.5,-30.5
  Top keep-out region: -21.5,28.5 21.5,28.5 21.5,-28.5 -21.5,-28.5
STA_RMCF0603_STP [mil] "STA_RMCF0603_STP"
  rect 19.69x35.43 smd: 1(-29.53,0) 2(29.53,0)
  Top keep-out region: -14.5,21.5 14.5,21.5 14.5,-21.5 -14.5,-21.5
  Top keep-out region: -14.5,19.5 14.5,19.5 14.5,-19.5 -14.5,-19.5
TQFP64_10X10MC_MCH [mil] "TQFP64_10X10MC_MCH"
  rect 57.56x11 smd: 1(-221,147.64) 2(-221,127.95) 3(-221,108.27) 4(-221,88.58) 5(-221,68.9) 6(-221,49.21) 7(-221,29.53) 8(-221,9.84) 9(-221,-9.84) 10(-221,-29.53) 11(-221,-49.21) 12(-221,-68.9) 13(-221,-88.58) 14(-221,-108.27) 15(-221,-127.95) 16(-221,-147.64) 33(221,-147.64) 34(221,-127.95) 35(221,-108.27) 36(221,-88.58) 37(221,-68.9) 38(221,-49.21) 39(221,-29.53) 40(221,-9.84) 41(221,9.84) 42(221,29.53) 43(221,49.21) 44(221,68.9) 45(221,88.58) 46(221,108.27) 47(221,127.95) 48(221,147.64)
  rect 11x57.56 smd: 17(-147.64,-221) 18(-127.95,-221) 19(-108.27,-221) 20(-88.58,-221) 21(-68.9,-221) 22(-49.21,-221) 23(-29.53,-221) 24(-9.84,-221) 25(9.84,-221) 26(29.53,-221) 27(49.21,-221) 28(68.9,-221) 29(88.58,-221) 30(108.27,-221) 31(127.95,-221) 32(147.64,-221) 49(147.64,221) 50(127.95,221) 51(108.27,221) 52(88.58,221) 53(68.9,221) 54(49.21,221) 55(29.53,221) 56(9.84,221) 57(-9.84,221) 58(-29.53,221) 59(-49.21,221) 60(-68.9,221) 61(-88.58,221) 62(-108.27,221) 63(-127.95,221) 64(-147.64,221)
TSOT-25_DIODES-INC [mm] "TSOT-25_DIODES-INC"
  rect 1x0.7 smd: 1(-1.1,0.95) 2(-1.1,0) 3(-1.1,-0.95) 4(1.1,-0.95) 5(1.1,0.95)
TST_POINT_PTH_20X40MIL_2PIN [mil] "TST_POINT_PTH_20X40MIL_2PIN"
  round 40 hole 20: P$1(0,0) P$2(0,0)
TST_POINT_PTH_042-OCT [mil] "TST_POINT_PTH_042-OCT"
  round 72 hole 42: P$1(0,0)
UBLOX_24LCC [mil] "UBLOX_24LCC"
  rect 70.87x31.5 smd: 1(236.24,-275.75) 2(236.24,-232.45) 3(236.24,-189.14) 4(236.24,-145.83) 5(236.24,-102.53) 6(236.24,-59.22) 7(236.24,-15.91) 8(236.24,102.2) 9(236.24,145.51) 10(236.24,188.81) 11(236.24,232.12) 12(236.24,275.43) 13(-236.24,275.75) 14(-236.24,232.45) 15(-236.24,189.14) 16(-236.24,145.83) 17(-236.24,102.53) 18(-236.24,-15.58) 19(-236.24,-58.89) 20(-236.24,-102.2) 21(-236.24,-145.51) 22(-236.24,-188.81) 23(-236.24,-232.12) 24(-236.24,-275.43)
VQFN100_KDX_MCH [mil] "VQFN100_KDX_MCH"
  rrect50% 40x8 smd: 1(-228,188.98) 25(-228,-188.98) 51(228,-188.98) 75(228,188.98)
  rect 40x8 smd: 2(-228,173.23) 3(-228,157.48) 4(-228,141.73) 5(-228,125.98) 6(-228,110.24) 7(-228,94.49) 8(-228,78.74) 9(-228,62.99) 10(-228,47.24) 11(-228,31.5) 12(-228,15.75) 13(-228,0) 14(-228,-15.75) 15(-228,-31.5) 16(-228,-47.24) 17(-228,-62.99) 18(-228,-78.74) 19(-228,-94.49) 20(-228,-110.24) 21(-228,-125.98) 22(-228,-141.73) 23(-228,-157.48) 24(-228,-173.23) 52(228,-173.23) 53(228,-157.48) 54(228,-141.73) 55(228,-125.98) 56(228,-110.24) 57(228,-94.49) 58(228,-78.74) 59(228,-62.99) 60(228,-47.24) 61(228,-31.5) 62(228,-15.75) 63(228,0) 64(228,15.75) 65(228,31.5) 66(228,47.24) 67(228,62.99) 68(228,78.74) 69(228,94.49) 70(228,110.24) 71(228,125.98) 72(228,141.73) 73(228,157.48) 74(228,173.23)
  rrect50% 8x40 smd: 26(-188.98,-228) 50(188.98,-228) 76(188.98,228) 100(-188.98,228)
  rect 8x40 smd: 27(-173.23,-228) 28(-157.48,-228) 29(-141.73,-228) 30(-125.98,-228) 31(-110.24,-228) 32(-94.49,-228) 33(-78.74,-228) 34(-62.99,-228) 35(-47.24,-228) 36(-31.5,-228) 37(-15.75,-228) 38(0,-228) 39(15.75,-228) 40(31.5,-228) 41(47.24,-228) 42(62.99,-228) 43(78.74,-228) 44(94.49,-228) 45(110.24,-228) 46(125.98,-228) 47(141.73,-228) 48(157.48,-228) 49(173.23,-228) 77(173.23,228) 78(157.48,228) 79(141.73,228) 80(125.98,228) 81(110.24,228) 82(94.49,228) 83(78.74,228) 84(62.99,228) 85(47.24,228) 86(31.5,228) 87(15.75,228) 88(0,228) 89(-15.75,228) 90(-31.5,228) 91(-47.24,228) 92(-62.99,228) 93(-78.74,228) 94(-94.49,228) 95(-110.24,228) 96(-125.98,228) 97(-141.73,228) 98(-157.48,228) 99(-173.23,228)
  rect 319x319 smd paste+0: 101(0,0)

## Part data
1V2 3V3 5V 5VIN 5VMB !GNSSPWREN !GNSSVBEN !URST !VB1FLT !VB2FLT !VB3FLT !VB4FLT -5VMB ATEST GND GNSS3V3 GNSSGND GNSSINT GNSSPLS GNSSRX GNSSTX GNSSVDDU MBPWREN PCVBUS PIC_RA1 PIC_RA4 PIC_RA5 PIC_RC1 PIC_RE2 PIC_RE3 PIC_RE4 PIC_RF4 PIC_RF5 PIC_RF6 TEMP_5V TMPWREN VBUS1 VBUS2 VBUS3 VBUS4: library part TST_POINT_PTH_042-OCT, PackageName=TST_POINT_PTH_042-OCT
5V_ON: library part LED_0603_LITE-ON, PackageName=LED_0603_LITE-ON
!GNSSRES !HUBRES ANEXTEMP GNSSANTDET GNSSANTOK RXD1 RXD2 SCK1 SCK2 SDI1 SDI2 SDO1 SDO2 SS1 SS1AUX SS2 SS2AUX TXD1 TXD2: library part TST_POINT_PTH_20X40MIL_2PIN, PackageName=TST_POINT_PTH_20X40MIL_2PIN
C1 C2 C3 C4 C5 C6 C7 C8 C9 C11 C12 C13 C14 C15 C16 C17 C18 C19 C20 C21 C22 C23 C24 C25 C28 C29 C30 C31 C33 C34 C35 C36 C37 C38 C39 C40 C41 C42 C43 C44 C45 C46 C47 C48 C49 C50 C53 C54 C55 C58 C59 C60 C61 C62 C63 C64 C65 C66 C67 C68 C69 C71 C72 C73 C74 C75 C76 C78 C81: library part G-155_MUR, PackageName=G-155_MUR
C10 C26 C27 C32 C51 C52 C56 C70 C77 C79 C80: library part CAP_C1608_TDK, PackageName=CAP_C1608_TDK
CR1: library part SOD-923F_COMCHIP, PackageName=SOD-923F_COMCHIP
GNSSPULSE: library part LED_DIALIGHT_598_DIA, PackageName=LED_DIALIGHT_598_DIA
J1: library part CON_1053131306, PackageName=CON_1053131306
J2: library part CON_1053141310, PackageName=CON_1053141310
J3: library part CON_1053131303, PackageName=CON_1053131303
J4: library part 3M_N3314-5302RB_RA, PackageName=3M_N3314-5302RB_RA
J5: library part SAMTEC_SMA-J-P-X-ST-TH1, PackageName=SAMTEC_SMA-J-P-X-ST-TH1
J6: library part CON_1053131304, PackageName=CON_1053131304
J7 J8 J9: library part CON_1054301305_MOL, PackageName=CON_1054301305_MOL
J10 J11: library part MOLEX_VERT-HDR_171861004, PackageName=MOLEX_VERT-HDR_171861004
J12: library part CONN_GRPB031VWVN-RC_SUL, PackageName=CONN_GRPB031VWVN-RC_SUL
L1: library part IND_TAIYO_NR3012_TAY, PackageName=IND_TAIYO_NR3012_TAY
L2: library part INDUCTOR_0603_TDK, PackageName=INDUCTOR_0603_TDK
PK3: library part CON_901311086_MOL, PackageName=CON_901311086_MOL
PTH1 PTH2 PTH3 PTH4: library part PTH_M4_4.5MM-ID, PackageName=PTH_M4_4.5MM-ID
Q1 Q5: library part SO-8L-NB_FAS, PackageName=SO-8L-NB_FAS
Q2 Q4 Q6 Q7 Q8: library part SC-75(SOT-416)_ONSEMI, PackageName=SC-75(SOT-416)_ONSEMI
Q3: library part SOT_1CDS-T1-BE3_VIS, PackageName=SOT_1CDS-T1-BE3_VIS
R1 R2 R3 R4 R5 R6 R7 R8 R9 R10 R11 R12 R13 R14 R15 R16 R17 R18 R19 R20 R21 R22 R23 R24 R25 R26 R27 R28 R29 R30 R31 R32 R33 R34 R35 R36 R37 R38 R39 R40 R41 R42 R43 R44 R45 R46 R47 R48 R49 R50 R51 R56 R58: library part RESC1005X35N, PackageName=RESC1005X35N
R52 R53 R54 R55: library part STA_HCJ0805_STP, PackageName=STA_HCJ0805_STP
R57: library part STA_RMCF0603_STP, PackageName=STA_RMCF0603_STP
U1 U14 U15: library part DBV0005A_L, PackageName=DBV0005A_L
U2: library part DBV5_TEX, PackageName=DBV5_TEX
U3 U7 U8 U9: library part SOT-23-6_AOS, PackageName=SOT-23-6_AOS
U4: library part 21-0061L_MXM, PackageName=21-0061L_MXM
U5: library part SOIC127P600X175-8N, PackageName=SOIC127P600X175-8N
U6: library part 21-0041B_14_MXM, PackageName=21-0041B_14_MXM
U10 U11 U12 U13: library part TSOT-25_DIODES-INC, PackageName=TSOT-25_DIODES-INC
U16: library part UBLOX_24LCC, PackageName=UBLOX_24LCC
U17: library part TQFP64_10X10MC_MCH, PackageName=TQFP64_10X10MC_MCH
U18: library part SOT-23_M3_MCH, PackageName=SOT-23_M3_MCH
U19: library part VQFN100_KDX_MCH, PackageName=VQFN100_KDX_MCH
Y1: library part OSC_ECS-2033-250-BN, PackageName=OSC_ECS-2033-250-BN

## Nets (pads, with @x,y where several pads share a name; then routed paths per layer and width w, separated by ;. In a path a pad name is that pad's centre, name@x,y a point inside that pad or via, vN(x,y) a via of type N, cw(c..) or ccw(c..) an arc to the next point about the centre after c; other vN are vias at no path point)
1.2V: 1V2.P$1 C25.1 C28.1 C29.1 C30.1 C31.1 C35.1 C36.1 C37.1 C38.1 C39.1 C40.1 C41.1 C42.1 C45.1 C46.1 C47.1 C48.1 C53.1 C55.1 C80.1 L1.1 U2.4 U19.9 U19.18 U19.25 U19.33 U19.41 U19.55 U19.78 U19.83 U19.93
3.3V: 3V3.P$1 C4.1 C5.1 C6.1 C7.1 C8.1 C9.1 C14.1 C15.1 C16.1 C17.1 C18.1 C21.1 C22.1 C23.1 C24.1 C44.1 C49.1 C73.1 C81.1 R16.1 R17.1 R19.1 R20.1 R24.1 R42.1 U1.5 U18.3 U19.26 U19.44 U19.53 U19.62 U19.67 U19.79 U19.86 U19.99 Y1.1 Y1.4
3V3_EN: R30.2 U17.39
5V: 5V.P$1 C1.1 C2.1 C10.1 C11.1 C12.1 C27.1 C33.1 C34.1 C50.1 C58.1 C62.1 C71.1 C72.1 C74.1 C75.1 C77.1 C78.1 C79.1 PK3.4 Q1.1 Q1.2 Q1.3 Q3.2 Q5.1 Q5.2 Q5.3 R4.1 R5.2 R6.2 R8.2 R13.1 R26.2 R27.2 R28.2 R29.1 R38.2 R44.2 R56.2 R58.1 U1.1 U2.1 U2.3 U4.1 U6.4 U6.14 U10.4 U11.4 U12.4 U13.4 U14.1 U17.10 U17.19 U17.26 U17.38 U17.57
5V_MB: 5VMB.P$1 C56.1 J4.3 J4.4 PK3.3 Q5.5 Q5.6 Q5.7 Q5.8 R12.2 U5.1 U5.6
!GNSS_PWR_EN: !GNSSPWREN.P$1 R35.1 U17.22
!GNSS_RES: !GNSSRES.P$1 !GNSSRES.P$2 R7.1 U16.8 U17.17
!GNSS_VBUS_EN: !GNSSVBEN.P$1 R11.1 U17.15
!HUB_RES: !HUBRES.P$1 !HUBRES.P$2 R36.1 U17.48
!SPI1_SS: J1.3 SS1.P$1 SS1.P$2 U17.11
!SPI1_SS_AUX: J10.4 SS1AUX.P$1 SS1AUX.P$2 U17.33
!SPI2_SS: R17.2 SS2.P$1 SS2.P$2 U17.49 U19.69
!SPI2_SS_AUX: J11.4 SS2AUX.P$2
!URST: !URST.P$1 Q8.3 R42.2 U18.2 U19.1
!VBUS1_FLT: !VB1FLT.P$1 R38.1 U10.3 U17.16
!VBUS2_FLT: !VB2FLT.P$1 R26.1 U11.3 U17.45
!VBUS3_FLT: !VB3FLT.P$1 R27.1 U12.3 U17.53
!VBUS4_FLT: !VB4FLT.P$1 R28.1 U13.3 U17.44
-5V_MB: -5VMB.P$1 C32.1 J4.11 J4.12 R37.2 U5.5
ANA_EXT_TEMP: ANEXTEMP.P$1 ANEXTEMP.P$2 J6.2 R10.1 U17.24
CLK_25MHZ: U19.98 Y1.3
EXT_TEMP_5V: J6.3 Q3.3 TEMP_5V.P$1
GND: 5V_ON.1 C1.2 C2.2 C4.2 C5.2 C6.2 C7.2 C8.2 C9.2 C10.2 C11.2 C12.2 C13.2 C14.2 C15.2 C16.2 C17.2 C18.2 C19.2 C20.2 C21.2 C22.2 C23.2 C24.2 C25.2 C26.2 C27.2 C28.2 C29.2 C30.2 C31.2 C32.2 C33.2 C34.2 C35.2 C36.2 C37.2 C38.2 C39.2 C40.2 C41.2 C42.2 C43.2 C44.2 C45.2 C46.2 C47.2 C48.2 C49.2 C50.2 C51.2 C52.2 C53.2 C54.2 C55.2 C56.2 C58.2 C59.2 C60.1 C61.2 C62.2 C65.1 C66.2 C67.1 C70.2 C71.2 C72.2 C73.2 C74.2 C75.2 C77.2 C78.2 C79.2 C80.2 C81.2 CR1.2 GND.P$1 GNSSGND.P$1 GNSSPULSE.1 J1.2 J2.4 J2.7 J3.1 J4.1 J4.13 J4.14 J5.2 J5.3 J5.4 J5.5 J6.1 J6.4 J7.4 J8.4 J9.4 J12.3 PK3.5 PK3.6 Q1.4 Q2.2 Q4.2 Q6.2 Q7.2 Q8.2 R8.1 R9.2 R10.2 R14.2 R15.2 R21.1 R23.1 R25.2 R31.2 R32.2 R34.2 R40.2 R48.2 R49.2 R50.2 R51.2 R52.1 R53.1 R54.1 R55.1 U1.2 U2.2 U3.2 U4.10 U5.3 U5.8 U6.3 U6.6 U6.7 U7.2 U8.2 U9.2 U10.2 U11.2 U12.2 U13.2 U14.2 U15.2 U16.10 U16.12 U16.13 U16.24 U17.9 U17.20 U17.25 U17.41 U17.56 U18.1 U19.101 Y1.2
GNSS_ANT: CR1.1 J5.1 L2.1 U16.11
GNSS_ANT_DET: GNSSANTDET.P$1 GNSSANTDET.P$2 U16.15 U17.18
GNSS_ANT_OK: GNSSANTOK.P$1 GNSSANTOK.P$2 U16.16 U17.21
GNSS_VCC_3V3: C59.1 GNSS3V3.P$1 R7.2 U14.5 U16.22 U16.23
GNSS_VDDUSB_3V3: C20.1 GNSSVDDU.P$1 R9.1 U15.5 U16.7
MB_PWR_EN: MBPWREN.P$1 R1.1 U17.30
N$1: L1.2 U2.5
N$2: C3.1 U4.9
N$3: PTH1.P$1 R52.2
N$4: C3.2 U4.2
N$5: C13.1 U4.8
N$6: R29.2 R30.1 U1.3
N$7: PIC_RF6.P$1 U17.12
N$8: PTH2.P$1 R53.2
N$9: Q2.3 Q3.1 R5.1
N$10: Q2.1 R31.1 R41.1
N$11: R2.1 R45.1 U16.6
N$12: R3.1 R46.1 U16.5
N$13: Q6.3 R6.1 U14.3
N$14: GNSSTX.P$1 U16.20
N$15: PTH3.P$1 R54.2
N$16: Q6.1 R35.2 R50.1
N$17: Q7.3 R47.2 U15.3
N$18: C60.2 J9.5 R25.1
N$19: PTH4.P$1 R55.2
N$20: TXD2.P$1 U17.4
N$21: Q4.3 Q5.4 R13.2
N$22: C65.2 J8.5 R32.1
N$23: R37.1 R39.2 U5.7
N$24: C69.1 J2.9
N$25: C68.1 J2.8
N$26: C64.1 J2.6
N$27: C63.1 J2.5
N$28: R14.1 R24.2 U19.21
N$29: R34.1 U19.22
N$30: R15.1 U19.24
N$31: R20.2 U19.63
N$32: R19.2 U19.65
N$33: R21.2 U19.100
N$34: R16.2 U19.64
N$35: ATEST.P$1 U19.96
N$36: Q4.1 R1.2 R48.1
N$37: PIC_RF5.P$1 U17.13
N$38: GNSSRX.P$1 U16.21
N$39: PIC_RF4.P$1 U17.14
N$40: PIC_RA1.P$1 U17.23
N$41: R33.1 U16.3
N$42: GNSSINT.P$1 U16.4
N$43: RXD2.P$1 U17.5
N$44: R12.1 R39.1
N$45: C76.1 U5.2
N$46: C76.2 U5.4
N$47: SS2AUX.P$1 U17.1
N$48: J12.1 PIC_RA5.P$1 U17.27
N$49: J12.2 PIC_RA4.P$1 U17.28
N$50: 5V_ON.2 R56.1
N$51: GNSSPLS.P$1 GNSSPULSE.2 R33.2
N$52: C67.2 J7.5 R40.1
N$53: PIC_RC1.P$1 U17.29
N$54: PIC_RE2.P$1 U17.64
N$55: PIC_RE3.P$1 U17.63
N$56: PIC_RE4.P$1 U17.62
N$57: R44.1 U4.3
N$59: C26.1 L2.2 R57.1
PC_USB2_HOST_DM: J2.2 R43.2 R46.2 U3.1
PC_USB2_HOST_DP: J2.3 R18.2 R45.2 U3.3
PC_VBUS: J2.1 PCVBUS.P$1 R22.2 U3.5
PRT_CTL1: U10.1 U19.60
PRT_CTL2: U11.1 U19.58
PRT_CTL3: U12.1 U19.59
PRT_CTL4: U13.1 U19.56
PWR_BYP2: Q7.1 R11.2 R49.1
PWR_BYP3: Q8.1 R36.2 R51.1
PWR_IN_5V: 5VIN.P$1 J1.1 Q1.5 Q1.6 Q1.7 Q1.8
RB6(PGC)_IB: PK3.10 U17.42
RB6(PGC)_MB: J4.7 PK3.9
RB7(PGD)_IB: PK3.8 U17.37
RB7(PGD)_MB: J4.8 PK3.7
RS232_CH1_IN: J3.3 U4.6
RS232_CH1_OUT: J3.2 U4.7
RX+: J4.5 U6.12
RX-: J4.6 U6.11
SPI1_SCK: J1.6 J10.3 SCK1.P$1 SCK1.P$2 U17.34
SPI1_SDI: J1.5 J10.2 SDI1.P$1 SDI1.P$2 U17.35
SPI1_SDO: J1.4 J10.1 SDO1.P$1 SDO1.P$2 U17.36
SPI2_SCK: J11.3 SCK2.P$1 SCK2.P$2 U17.50 U19.68
SPI2_SDI: J11.2 SDI2.P$1 SDI2.P$2 U17.51 U19.70
SPI2_SDO: J11.1 SDO2.P$1 SDO2.P$2 U17.52 U19.71
TEMP_PWR_EN: R41.2 TMPWREN.P$1 U17.54
TX+: J4.9 U6.9
TX-: J4.10 U6.10
UART1_RXD: RXD1.P$1 RXD1.P$2 U6.2 U17.32
UART1_TXD: TXD1.P$1 TXD1.P$2 U6.5 U17.31
UART2_RXD: RXD2.P$2 U4.5
UART2_TXD: TXD2.P$2 U4.4
USB2DN-1_DM: R3.2 U19.6
USB2DN-1_DP: R2.2 U19.5
USB2DN-2_DM: J7.2 U7.1 U19.30
USB2DN-2_DP: J7.3 U7.3 U19.29
USB2DN-3_DM: J8.2 U8.1 U19.15
USB2DN-3_DP: J8.3 U8.3 U19.14
USB2DN-4_DM: J9.2 U9.1 U19.38
USB2DN-4_DP: J9.3 U9.3 U19.37
USB2DN_VBUS1: C19.1 C43.1 R47.1 R58.2 U10.5 U15.1 VBUS1.P$1
USB2DN_VBUS2: C54.1 C70.1 J7.1 U7.5 U11.5 VBUS2.P$1
USB2DN_VBUS3: C52.1 C61.1 J8.1 U8.5 U12.5 VBUS3.P$1
USB2DN_VBUS4: C51.1 C66.1 J9.1 U9.5 U13.5 VBUS4.P$1
USB2UP_DM: R43.1 U19.90
USB2UP_DP: R18.1 U19.89
USB3UP-A_RXDM: C63.2 U19.95
USB3UP-A_RXDP: C64.2 U19.94
USB3UP-A_TXDM: C68.2 U19.92
USB3UP-A_TXDP: C69.2 U19.91
VBUS_MON_UP: R22.1 R23.2 U19.80
VCC_RF: R57.2 U16.9
VPP: PK3.2 R4.2 U17.7
VPP_MB: J4.2 PK3.1
pads on no net: J1.7 J1.8 J2.10 J2.11 J2.12 J3.4 J3.5 J4.15 J4.16 J6.5 J6.6 J7.6 J7.7 J8.6 J8.7 J9.6 J9.7 PK3.11 PK3.12 U1.4 U3.4 U3.6 U6.1 U6.8 U6.13 U7.4 U7.6 U8.4 U8.6 U9.4 U9.6 U14.4 U15.4 U16.1 U16.2 U16.14 U16.17 U16.18 U16.19 U17.2 U17.3 U17.6 U17.8 U17.40 U17.43 U17.46 U17.47 U17.55 U17.58 U17.59 U17.60 U17.61 U19.2 U19.3 U19.4 U19.7 U19.8 U19.10 U19.11 U19.12 U19.13 U19.16 U19.17 U19.19 U19.20 U19.23 U19.27 U19.28 U19.31 U19.32 U19.34 U19.35 U19.36 U19.39 U19.40 U19.42 U19.43 U19.45 U19.46 U19.47 U19.48 U19.49 U19.50 U19.51 U19.52 U19.54 U19.57 U19.61 U19.66 U19.72 U19.73 U19.74 U19.75 U19.76 U19.77 U19.81 U19.82 U19.84 U19.85 U19.87 U19.88 U19.97

## Polygon pours and split planes (outlines as drawn)
GND on GND+Signal "Polygon_1_Net_GND" (solid, remove dead copper, shelved, pour order 3): 14,4136 3836,4136 3836,14 14,14
5V on PWR+Signal "Polygon_1_Net_5V" (solid, remove dead copper, pour order 2): 295,675 2305,675 2305,1102.03 1912.11,1505 615,1505 615,2535 1425,2535 1425,3415 2875,3415 2875,2595 3355,2595 3355,3725 295,3725
1.2V on PWR+Signal "Polygon_1_Net_1.2V" (solid, remove dead copper, pour order 1): 1805,2355 3005,2355 3005,2045 1515,2045 1515,3255 2705,3255 2705,2645 2595,2645 2595,3105 1805,3105
3.3V on PWR+Signal "Polygon_1_Net_3.3V" (solid, remove dead copper, pour order 0): 1845,3035 2555,3035 2555,2555 3355,2555 3355,2045 3045,2045 3045,2395 1845,2395

## Keep-outs
Keep-Out Layer:
  the board outline again, w0

## Silkscreen, mask and mechanical layers (free items; w line width, h text height)
Top Overlay:
  region: 3760,1400 3630,1400 3630,1800 3760,1800
  lines w8: 3620,575 3700,670 3790,590 3718,590 3718,625 3682,625 3682,525 3718,525 3718,560 3790,560 3700,480 3620,575
  text "TransTech Systems, Inc" at 3657,695 h29.75 r90
  text "PCB: 1700-0002 REV. A" at 3707,695 h29.75 r90
  text "PCA: 7500-0428 REV. A" at 3757,695 h29.75 r90
Dimension:
  the board outline again, w0
tPlace:
  lines w6: 219,1279 310,1279 333,1257 ; 219,1339 340,1339 358,1322 ; 282,1100 318,1100 336,1118 ; 2194,3114 2200,3120 2200,3150
ENG_NOTES:
  drawing of 177 lines, arcs and shapes, not listed
  text "EXT." at 880.06,4395.3 h85
  text "USB 2.0" at 1853.44,4390.3 h85
  text "(3 Nanofits)" at 1793.41,4255.3 h68
  text "SERIAL" at 140.93,4245.3 h85
  text "TEMP" at 858.82,4245.3 h85
  text "USB 3.0" at 3083.44,4245.3 h85
  text "AUX SPI" at -630.36,3366.01 h85
  text "PICKIT3" at -625.36,2651.01 h85
  text "INPUT PWR" at 4066.4,2455.3 h85
  text "& REG CKTS" at 4066.4,2305.3 h85
  text "AUX SPI" at -625.36,1911.01 h85
  text "G N S S" at -615.08,844.61 h85
  text "MEAS. BRD" at 1538.47,-458.27 h85

## Dimensions
449,270 to 3402,270 on tFinish
3402,270 to 3402,3223 on tFinish
0,4150 to 3850,4150 on tFinish
3850,4150 to 3850,0 on tFinish

## Text inside footprints (layer, text, board x,y; h text height)
5V_ON: tPlace "K" at 3705,1995 h29.75 r180
GNSSPULSE: tPlace "K" at 1100,1025 h25.5 r180
J1: tPlace "1" at 3548,2835 h68 r90
J2: tPlace "1" at 3070,3710 h42.5 r180; tPlace "5" at 3680,3710 h42.5 r180
J3: tPlace "1" at 180,3800 h42.5 r180
J4: tPlace "1" at 2277.58,472.92 h42.53; tPlace "2" at 2277.12,372.97 h42.55; tPlace "13" at 1512.07,478.78 h42.58; tPlace "14" at 1512.01,378.99 h42.52; tPlace "1" at 2675,550 h51 r180
J6: tPlace "1" at 770,3800 h42.5 r180
J7: tPlace "1" at 2240,3780 h42.5 r180
J8: tPlace "1" at 1440,3780 h42.5 r180
J9: tPlace "1" at 2270,3780 h42.5 r180
J10: tPlace "1" at 110,2220 h42.5 r270
J11: tPlace "1" at 110,3675 h42.5 r270
J12: tPlace "1" at 2073,1720 h42.5 r90
PK3: tPlace "1" at 38,3050 h42.5 r270; tPlace "2" at 138,3050 h42.5 r270
Q1: tPlace "1" at 3107,2842 h29.75 r90
Q5: tPlace "1" at 1662,883 h29.75
R52: Measures "Default Padstyle: RX30Y55D0T" at 3352,3869 h42.5 r270; Measures "Alt 1 Padstyle: OX60Y90D30P" at 3292,3853 h42.5 r270; Measures "Alt 2 Padstyle: OX90Y60D30P" at 3232,3853 h42.5 r270; Measures "0.055in/1.397mm" at 3638,3108 h21.25 r270; Measures "0.085in/2.159mm" at 3798,3429 h21.25 r270; Measures "0.022in/0.559mm" at 3478,3398 h21.25 r270
R53: Measures "Default Padstyle: RX30Y55D0T" at -409,2822 h42.5; Measures "Alt 1 Padstyle: OX60Y90D30P" at -393,2762 h42.5; Measures "Alt 2 Padstyle: OX90Y60D30P" at -393,2702 h42.5; Measures "0.055in/1.397mm" at 352,3108 h21.25; Measures "0.085in/2.159mm" at 31,3268 h21.25; Measures "0.022in/0.559mm" at 62,2948 h21.25
R54: Measures "Default Padstyle: RX30Y55D0T" at 498,-369 h42.5 r90; Measures "Alt 1 Padstyle: OX60Y90D30P" at 558,-353 h42.5 r90; Measures "Alt 2 Padstyle: OX90Y60D30P" at 618,-353 h42.5 r90; Measures "0.055in/1.397mm" at 212,392 h21.25 r90; Measures "0.085in/2.159mm" at 52,71 h21.25 r90; Measures "0.022in/0.559mm" at 372,102 h21.25 r90
R55: Measures "Default Padstyle: RX30Y55D0T" at 3948,-369 h42.5 r90; Measures "Alt 1 Padstyle: OX60Y90D30P" at 4008,-353 h42.5 r90; Measures "Alt 2 Padstyle: OX90Y60D30P" at 4068,-353 h42.5 r90; Measures "0.055in/1.397mm" at 3662,392 h21.25 r90; Measures "0.085in/2.159mm" at 3502,71 h21.25 r90; Measures "0.022in/0.559mm" at 3822,102 h21.25 r90
U1: tPlace "1" at 3274,2442 h29.75
U2: tPlace "1" at 2890,2446 h25.5
U3: tPlace "1" at 3260,3519 h25.5
U4: tPlace "1" at 894,3242 h25.5 r270
U5: tPlace "1" at 2626,882 h29.75
U6: tPlace "1" at 2195,882 h29.75
U7: tPlace "1" at 2460,3639 h25.5
U8: tPlace "1" at 1660,3549 h25.5
U9: tPlace "1" at 1955,3639 h25.5
U10: tPlace "1" at 504,1705 h25.5
U11: tPlace "1" at 2275,3639 h25.5 r90
U12: tPlace "1" at 1475,3639 h25.5 r90
U13: tPlace "1" at 1970,3534 h25.5 r90
U14: tPlace "1" at 1192,1311 h29.75 r270
U15: tPlace "1" at 284,1527 h29.75
U16: tPlace "1" at 451.97,1413.15 h29.75 r180; tPlace "24" at 948.03,1413.15 h29.75 r180; tPlace "12" at 451.97,806.85 h29.75 r180; tPlace "13" at 948.03,806.85 h29.75 r180
U17: tPlace "1" at 1023,2899 h29.75; tPlace "17" at 1073,2495 h29.75; tPlace "49" at 1389,2949 h29.75; tPlace "33" at 1437,2543 h29.75
U19: tPlace "1" at 1936,2940 h29.75; tPlace "26" at 1984,2456 h29.75; tPlace "51" at 2426,2506 h29.75; tPlace "76" at 2376,2988 h29.75